# Altium PCB PCB.PcbDoc (part 1 of 2)
Units mm, origin at the board's own origin, x right, y up, seen from the top; angles counter-clockwise.
Board outline 38 x 40 mm, 4 copper layers (Top Layer, Inner GND 1, Inner GND 2, Bottom Layer), stack 1.62 mm thick; 82 components, 76 nets, 342 pads, 250 vias.
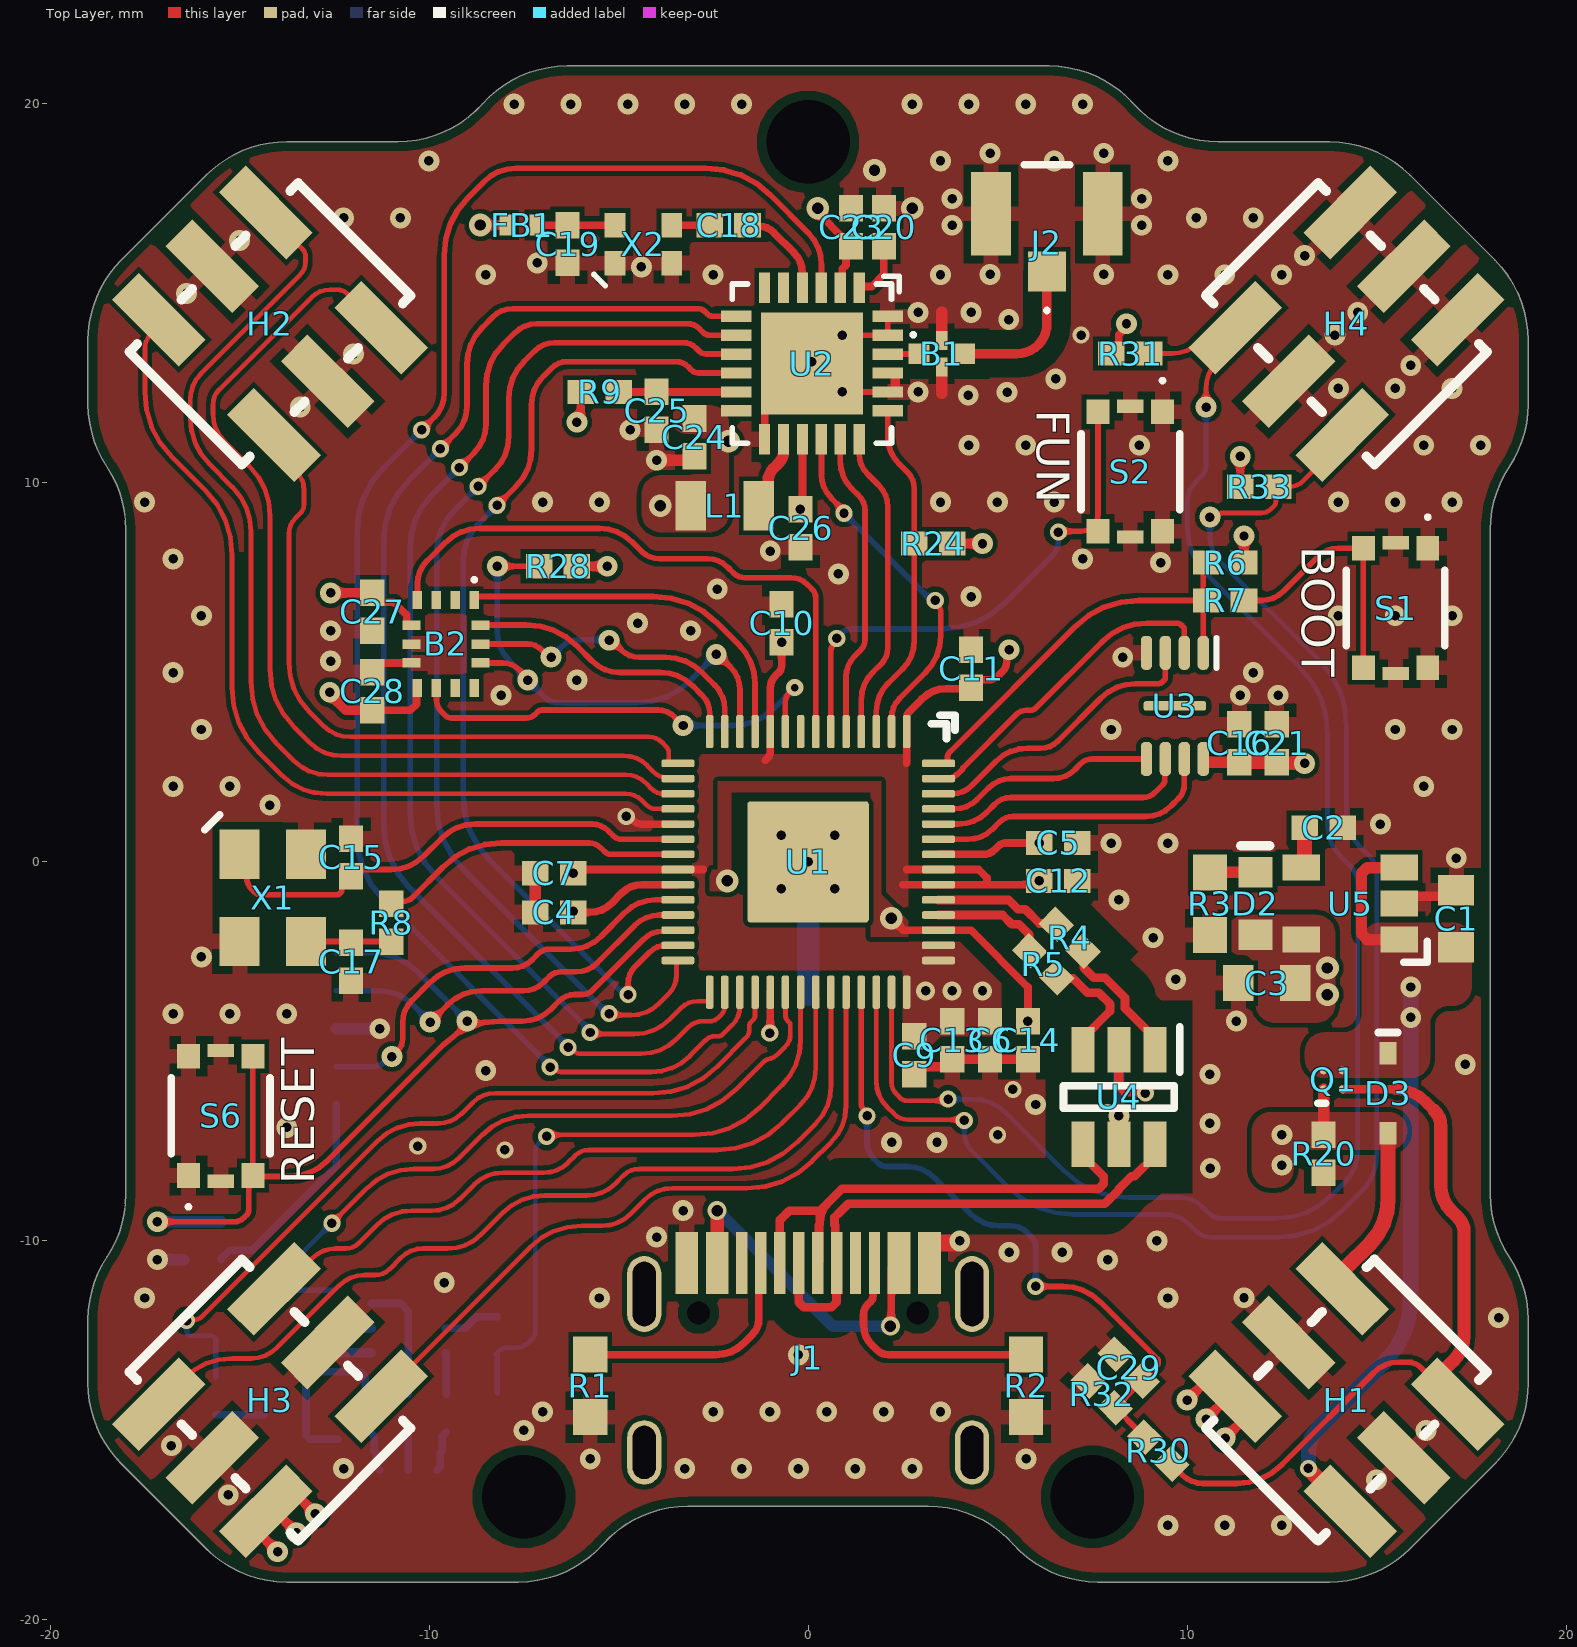
[diagram p0: Top Layer view]
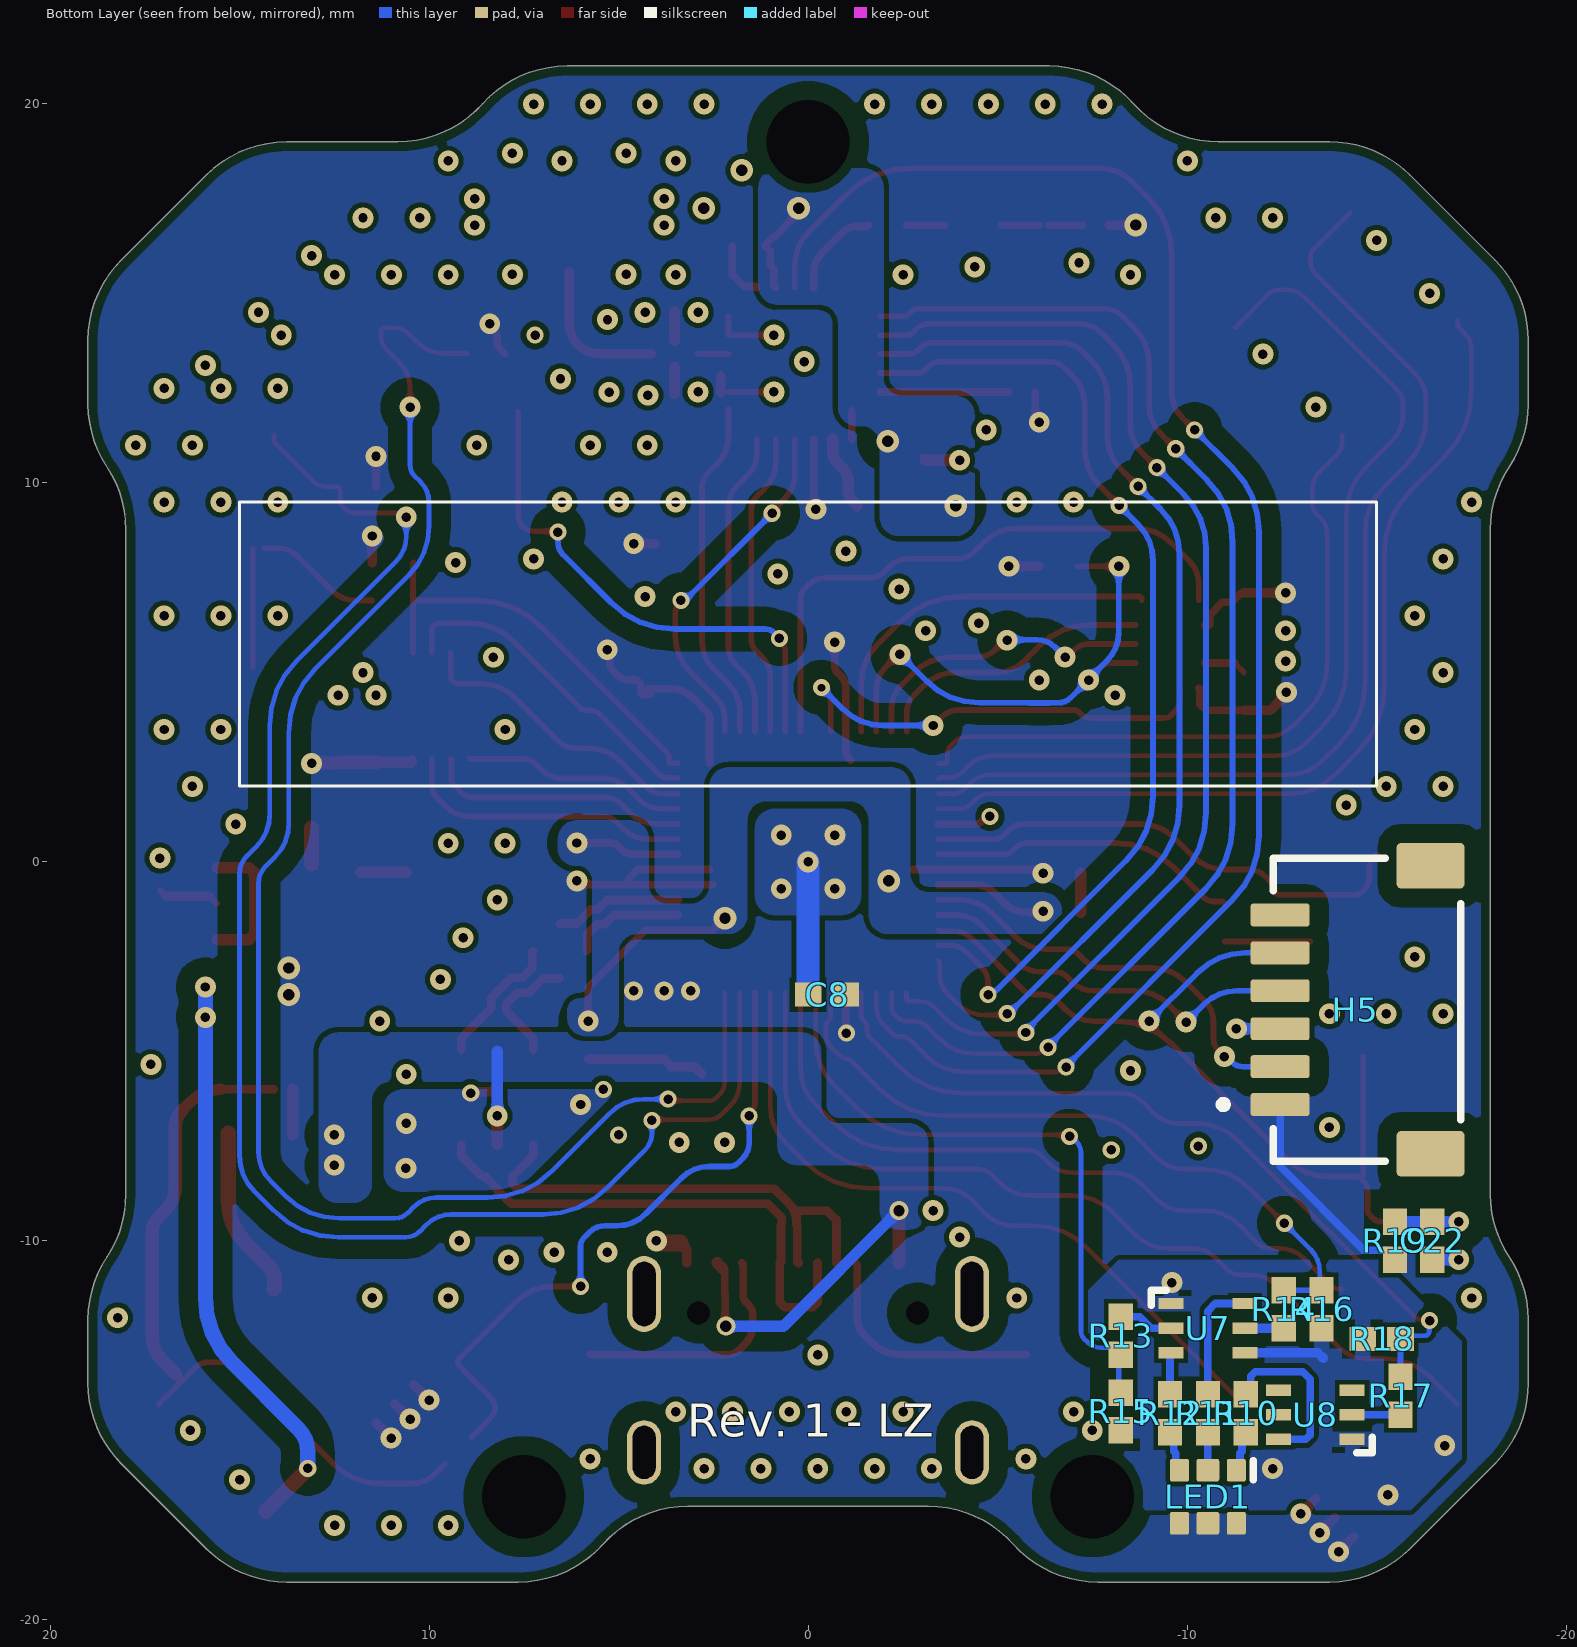
[diagram p1: Bottom Layer view, seen from below]
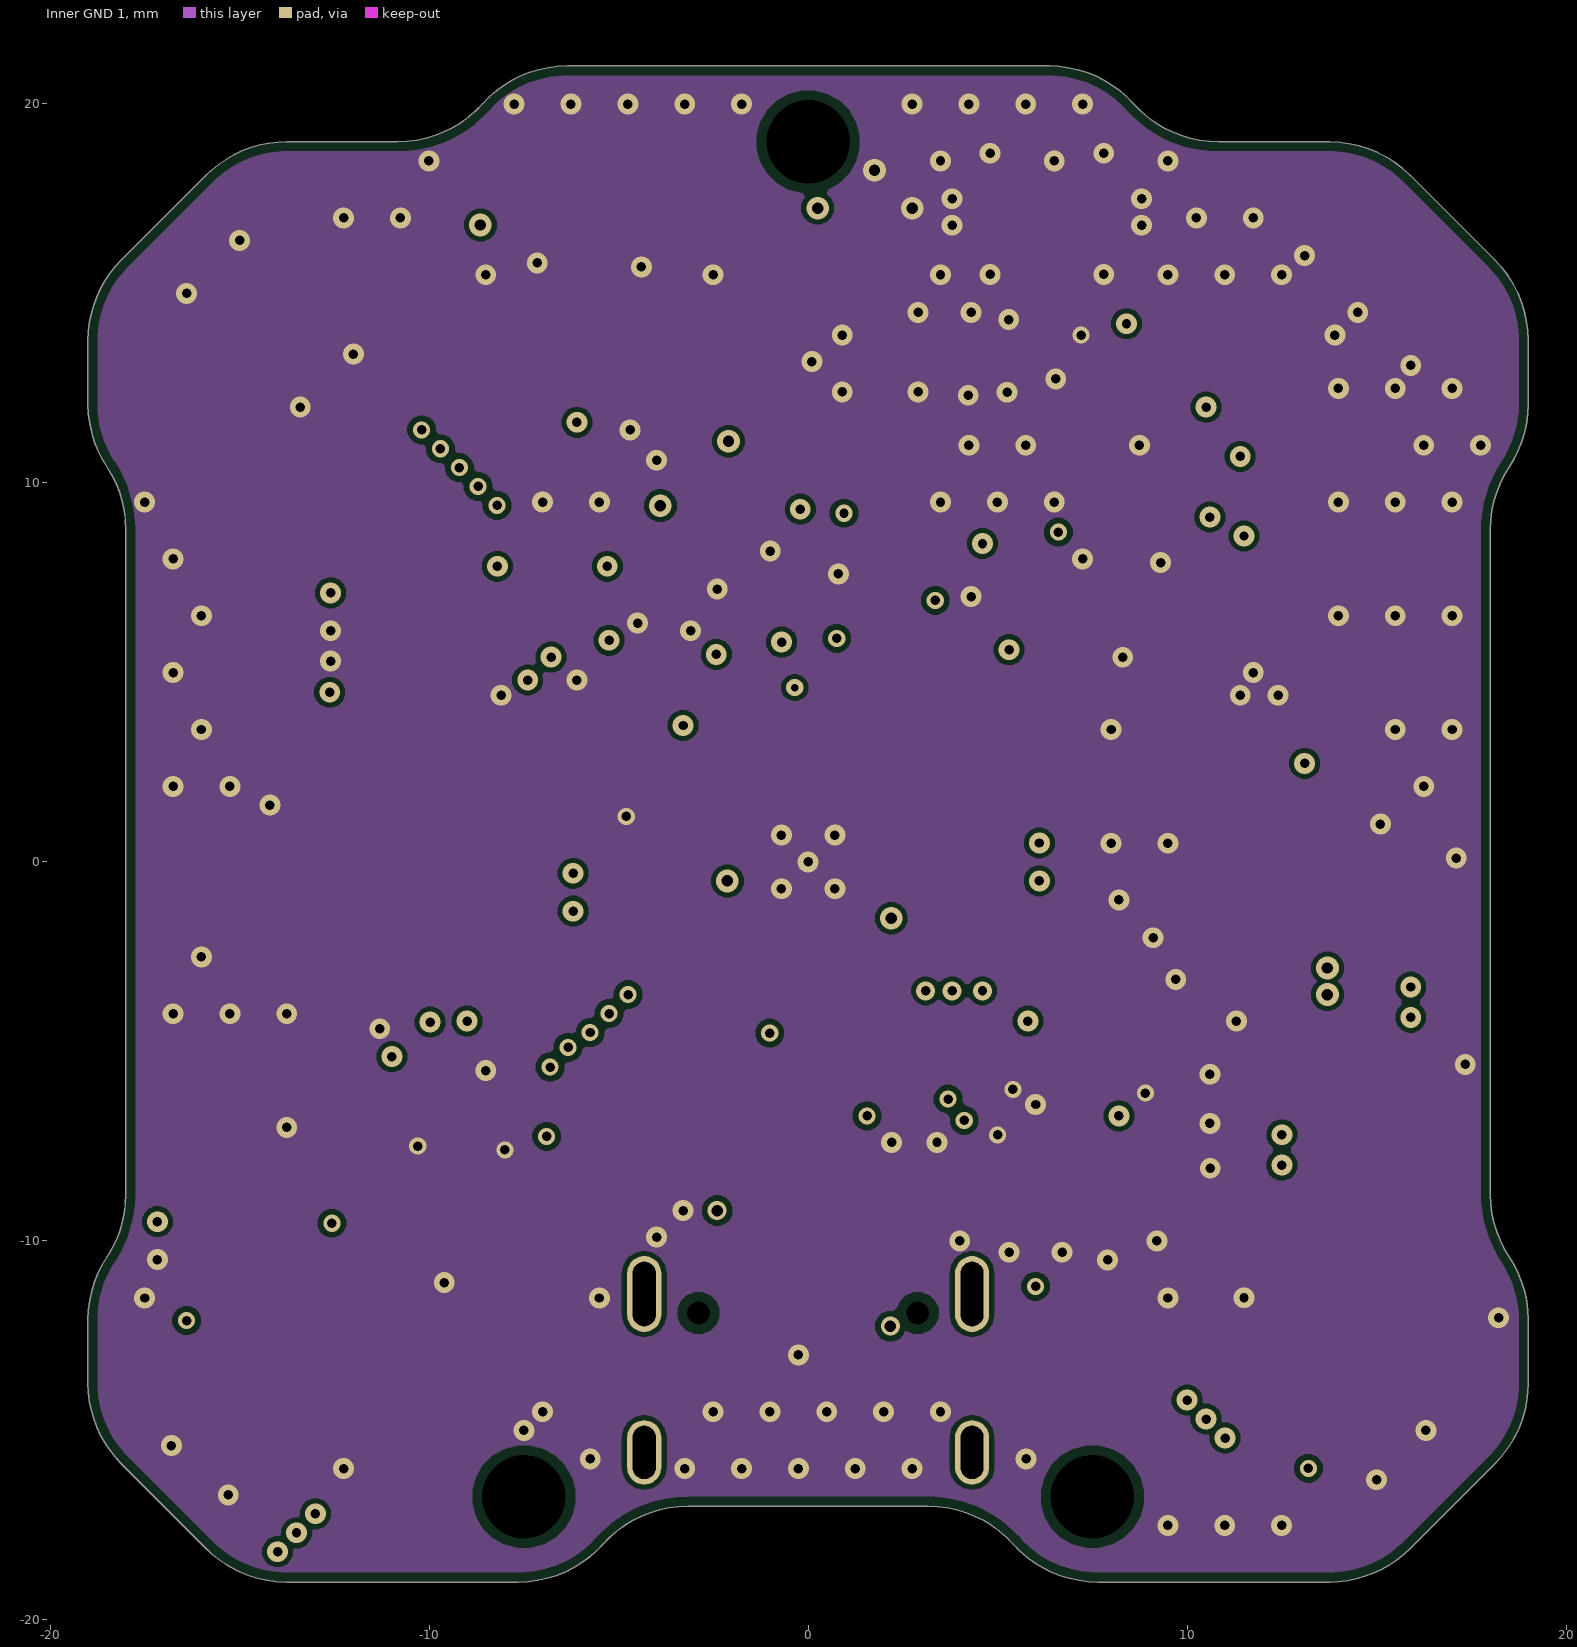
[diagram p2: Inner GND 1]
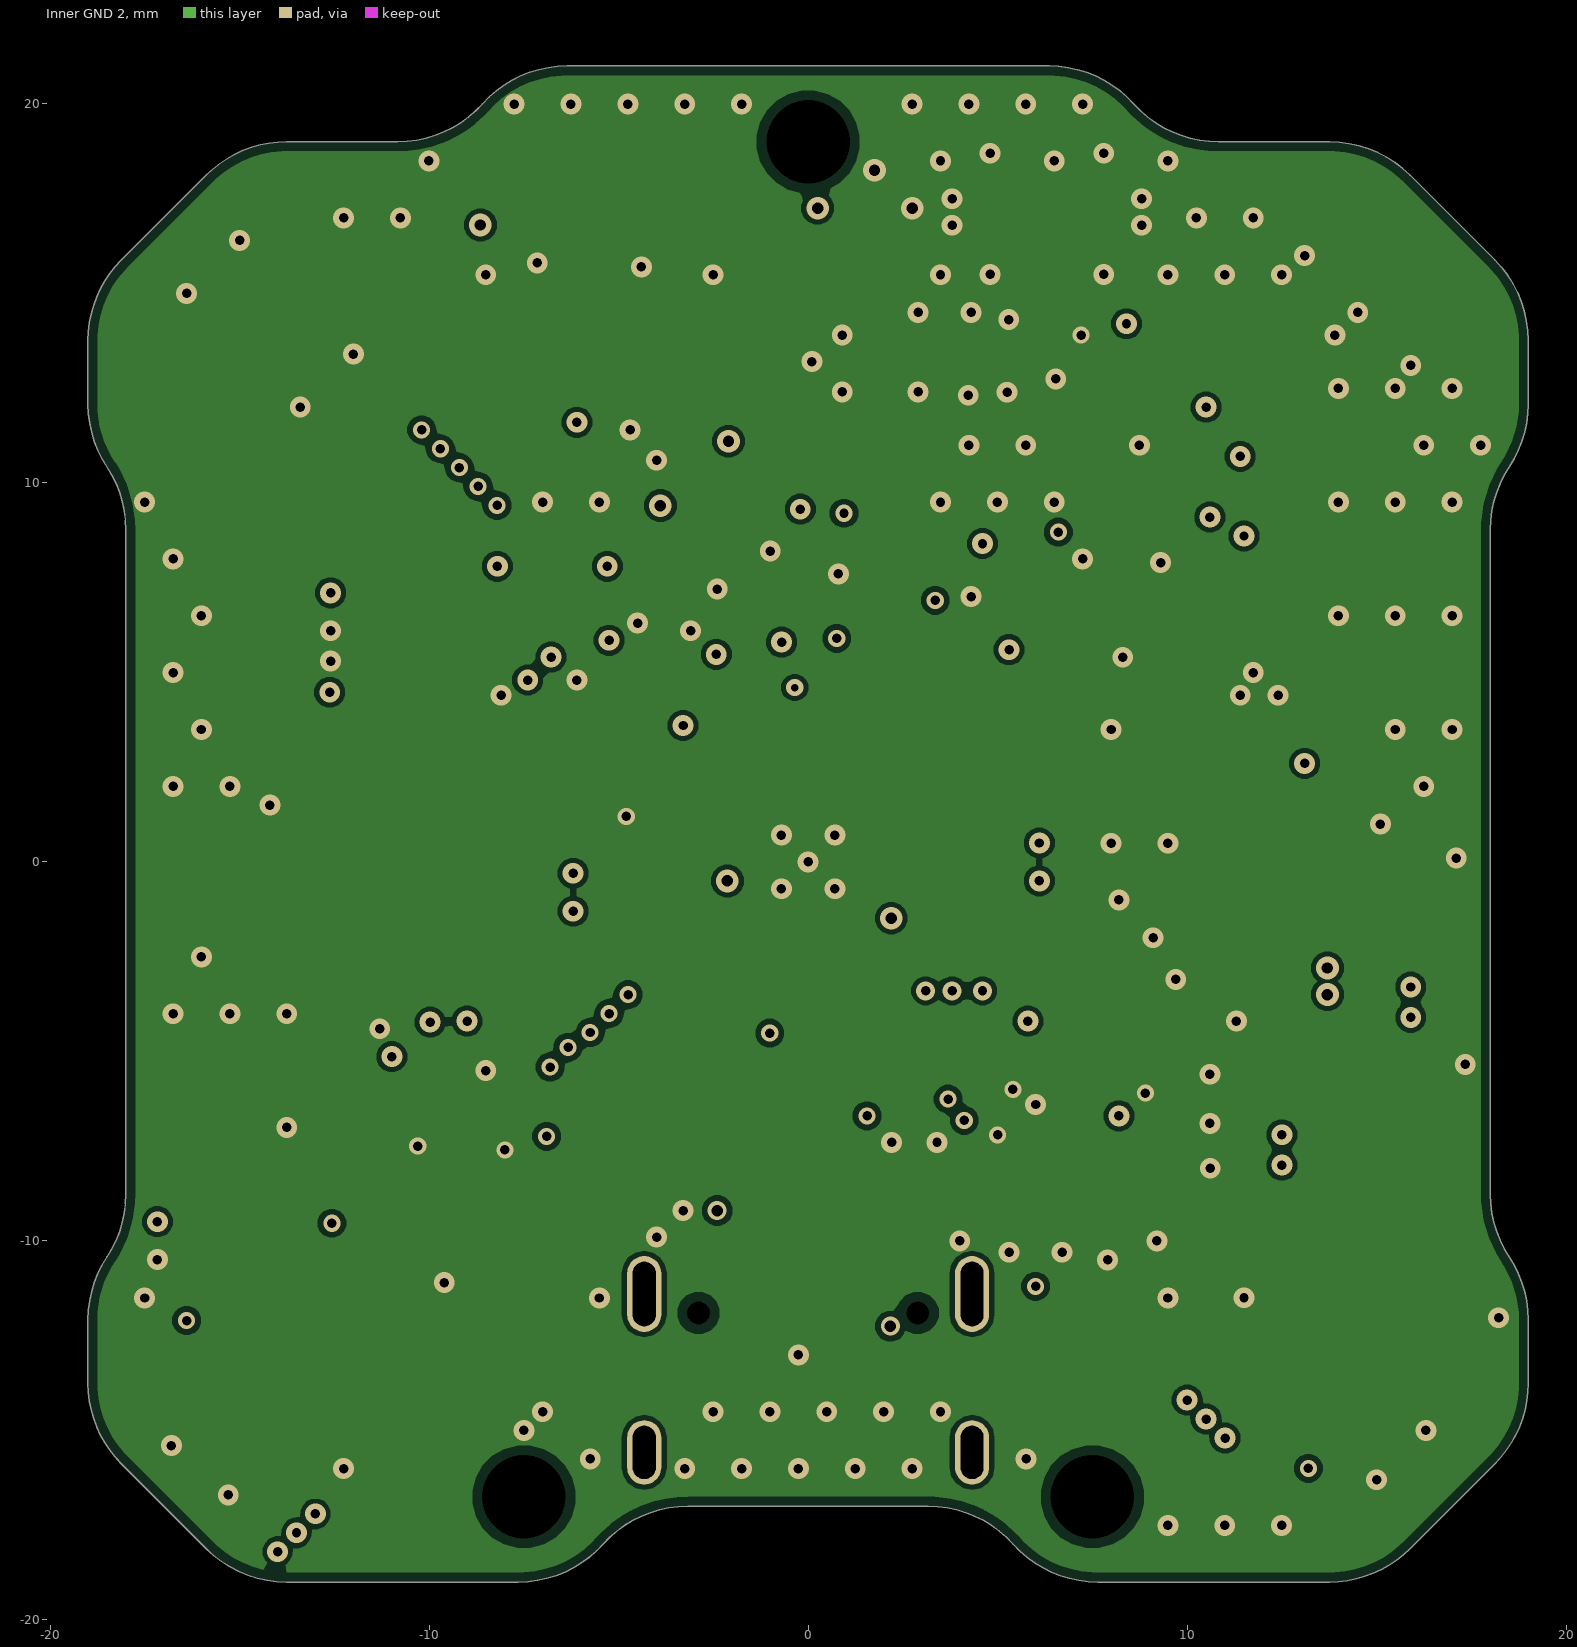
[diagram p3: Inner GND 2]

## Layer stack, top to bottom
Top Solder: solder mask 0.0102, Solder Resist, Dk 3.5
Top Layer: signal copper 0.035
Dielectric 2: prepreg 0.14, PP-006, Dk 4.1
Inner GND 1: signal copper 0.035
Dielectric 1: dielectric 1.2, FR-4, Dk 4.8
Inner GND 2: signal copper 0.035
Dielectric 3: prepreg 0.14, PP-006, Dk 4.1
Bottom Layer: signal copper 0.035
Bottom Solder: solder mask 0.0102, Solder Resist, Dk 3.5

## Board outline
-15.88,-18.12 -18.123,-15.878 cw(c-16.001,-13.756) -19.001,-13.756 -19.001,-12.079 cw(c-16.001,-12.079) -18.501,-10.421 ccw(c-21.001,-8.763) -18.001,-8.763 -18.001,8.765 ccw(c-21.001,8.765) -18.501,10.423 cw(c-16.001,12.082) -19.001,12.082 -19.001,13.758 cw(c-16.001,13.758) -18.123,15.88 -15.88,18.122 cw(c-13.759,16.001) -13.759,19.001 -10.83,19.001 ccw(c-10.83,22.001) -8.594,20.001 cw(c-6.358,18.001) -6.358,21.001 6.355,21.001 cw(c6.355,18.001) 8.591,20.001 ccw(c10.827,22.001) 10.827,19.001 13.756,19.001 cw(c13.756,16.001) 15.877,18.122 18.12,15.88 cw(c15.999,13.758) 18.999,13.758 18.999,12.082 cw(c15.999,12.082) 18.499,10.423 ccw(c20.999,8.765) 17.999,8.765 17.999,-8.763 ccw(c20.999,-8.763) 18.499,-10.421 cw(c15.999,-12.079) 18.999,-12.079 18.999,-13.756 cw(c15.999,-13.756) 18.12,-15.878 15.877,-18.12 cw(c13.756,-15.999) 13.756,-18.999 7.642,-18.999 cw(c7.642,-15.999) 5.406,-17.999 ccw(c3.17,-19.999) 3.17,-16.999 -3.173,-16.999 ccw(c-3.173,-19.999) -5.409,-17.999 cw(c-7.645,-15.999) -7.645,-18.999 -13.759,-18.999 cw(c-13.759,-15.999)

## Design rules (kind name [scope] priority, off if disabled: settings)
BoardOutlineClearance [All] p1: gap=0 ignorepadtopadclearanceinfootprint=FALSE except(0.2: Track-OutlineEdge Track-CavityEdge Track-CutoutEdge Track-SplitBarrior Track-SplitContinuation Via-OutlineEdge Via-CavityEdge Via-CutoutEdge Via-SplitBarrior Via-SplitContinuation Fill-OutlineEdge Fill-CavityEdge Fill-CutoutEdge Fill-SplitBarrior Fill-SplitContinuation; 0.25: Poly-OutlineEdge Poly-CavityEdge Poly-CutoutEdge Poly-SplitBarrior Poly-SplitContinuation)
Clearance Clearance_3v3 [InNet('+3V3') AND OnLayer('Bottom Layer') AND InPoly vs NOT InPoly AND (NOT InNet('GND'))] p1: gap=0.5 ignorepadtopadclearanceinfootprint=FALSE
Clearance Clearance_NPTH [IsBoardCutoutRegion vs InNet('GND')] p2: gap=0.25 ignorepadtopadclearanceinfootprint=FALSE
Clearance Clearance_DiffUSB [InNet('MCU_USB_D_P') OR InNet('MCU_USB_D_N') OR InNet('USB_D_P') OR InNet('USB_D_N') or InNet('MCU_USB_TERM_D_N') or InNet('MCU_USB_TERM_D_P') vs InNet('GND')] p3: gap=0.7 ignorepadtopadclearanceinfootprint=FALSE except(0.089: SMDPad-THPad THPad-THPad; 0.127: Arc-Arc Arc-Track Arc-SMDPad Arc-THPad Arc-Text Track-Track Track-SMDPad Track-THPad Track-Text SMDPad-SMDPad SMDPad-Via SMDPad-Text THPad-Via THPad-Text Via-Text Fill-Text Poly-Text Region-Text Text-Text; 0.25: Arc-Hole Track-Hole SMDPad-Hole THPad-Hole Via-Hole Fill-Hole Poly-Hole Region-Hole Text-Hole; 0.254: Arc-Via Track-Via Via-Via)
Clearance Clearance_RF [InNet('RF') AND (IsTrack OR IsArc) vs (InNet('GND') AND InPoly)] p4: gap=0.5 ignorepadtopadclearanceinfootprint=FALSE except(0.089: SMDPad-THPad THPad-THPad; 0.127: Arc-Arc Arc-Track Arc-SMDPad Arc-THPad Arc-Text Track-Track Track-SMDPad Track-THPad Track-Text SMDPad-SMDPad SMDPad-Via SMDPad-Text THPad-Via THPad-Text Via-Text Fill-Text Poly-Text Region-Text Text-Text; 0.25: Arc-Hole Track-Hole SMDPad-Hole THPad-Hole Via-Hole Fill-Hole Poly-Hole Region-Hole Text-Hole; 0.254: Arc-Via Track-Via Via-Via)
Clearance [All] p5: gap=0.127 ignorepadtopadclearanceinfootprint=FALSE except(0.089: SMDPad-THPad THPad-THPad; 0.25: Arc-Hole Track-Hole SMDPad-Hole THPad-Hole Via-Hole Fill-Hole Poly-Hole Region-Hole Text-Hole; 0.254: Arc-Via Track-Via Via-Via)
ComponentClearance ComponentClearance_1 [HasFootprint('SX1280IMLTRT') vs HasFootprint('2450FM07D0034001T')] p1: gap=0.006 collisioncheckmode=3 verticalgap=0.254 showdistances=FALSE
ComponentClearance [All] p2: gap=0.127 collisioncheckmode=3 verticalgap=0.254 showdistances=FALSE
DiffPairsRouting [All] p1: maxlimit=0.254 minlimit=0.165 mostfreqgap=0.254 toplayer_maxgap=0.165 toplayer_prefgap=0.165 toplayer_minwidth=0.23 toplayer_maxwidth=0.23 toplayer_prefwidth=0.23 midlayer1_mingap=0.254 midlayer1_minwidth=0.381 midlayer1_maxwidth=0.381 midlayer1_prefwidth=0.381 midlayer2_mingap=0.254 midlayer2_minwidth=0.381 midlayer2_maxwidth=0.381 midlayer2_prefwidth=0.381 bottomlayer_mingap=0.254 bottomlayer_minwidth=0.381 bottomlayer_maxwidth=0.381 bottomlayer_prefwidth=0.381 maxuncoupledlength=12.7
MinimumAnnularRing [All] p1: minimumring=0.1
MinimumSolderMaskSliver [All] p1: minsoldermaskwidth=0.04
PlaneConnect [All] p1: planeconnectstyle=Direct reliefexpansion=0.508 reliefentries=4 reliefconductorwidth=0.254 reliefairgap=0.254
PolygonConnect [InNet('GND')] p1: thpad.connectstyle=Relief thpad.reliefconductorwidth=0.4 thpad.reliefentries=4 thpad.polygonreliefangle="90 Angle" thpad.airgapwidth=0.2 smdpad.connectstyle=Relief smdpad.reliefconductorwidth=0.4 smdpad.reliefentries=4 smdpad.polygonreliefangle="90 Angle" smdpad.airgapwidth=0.2 via.connectstyle=Direct via.reliefconductorwidth=0.4 via.reliefentries=4 via.polygonreliefangle="90 Angle" via.airgapwidth=0.2
PolygonConnect PolygonConnect_AllButGND [Not InNet('GND') vs Not InNet('GND')] p2: connectstyle=Direct reliefconductorwidth=0.254 reliefentries=4 polygonreliefangle="90 Angle" airgapwidth=0.254
RoutingVias [All] p1: holewidth=0.25 width=0.55 viastyle="Through Hole" minholewidth=0.2 minwidth=0.45 maxholewidth=0.35 maxwidth=0.7
SilkToSilkClearance [All] p1: silktosilkclearance=0.15
SilkToSolderMaskClearance [IsPad] p1: minsilkscreentomaskgap=0.085 clearancetoexposedcopper=TRUE
SolderMaskExpansion [All] p1: expansion=0.038 istentingtop=FALSE
SupplyNets "Schematic Supply Nets_3" [InNet('+VUSB')] p1: voltage=0.000
SupplyNets "Schematic Supply Nets_2" [InNet('+VBAT')] p2: voltage=0.000
SupplyNets "Schematic Supply Nets" [InNet('+VSYS')] p3: voltage=0.000
SupplyNets "Schematic Supply Nets_7" [InNet('+3V3')] p4: voltage=0.000
SupplyNets "Schematic Supply Nets_4" [InNet('+1V1')] p5: voltage=0.000
SupplyNets "Schematic Supply Nets_1" [InNet('GND')] p6: voltage=0.000
Width Width_RF [InNet('RF')] p1: maxlimit=0.25 minlimit=0.111 preferedwidth=0.25 toplayer_minwidth=0.25 midlayer1_maxwidth=0.111 midlayer1_prefwidth=0.111 midlayer2_maxwidth=0.111 midlayer2_prefwidth=0.111 bottomlayer_minwidth=0.25 impedanceprofiledriven=TRUE impedanceprofileid={F64C656D-1B4E-4BC5-BB87-F1306D944459} impedanceprofilevalue=50.000000 minimp=50.000000 maximp=50.000000 favimp=50.000000
Width [All] p2: maxlimit=1 minlimit=0.12 preferedwidth=0.254 toplayer_prefwidth=0.15 midlayer1_prefwidth=0.15 midlayer2_minwidth=0.2 bottomlayer_prefwidth=0.15 minimp=50.000000 maximp=50.000000 favimp=50.000000
24 further rules are at their usual default settings.

## Classes and differential pairs
component class RF: B1 C18 C19 C20 C23 C24 C25 C26 FB1 J2 L1 R9 U2 X2
component class MCU: C4 C5 C6 C7 C8 C9 C10 C11 C12 C13 C14 C15 C16 C17 C21 C22 R4 R5 R6 R7 R8 R19 R24 R28 U1 U3 X1
component class Power: C1 C2 C3 D2 D3 J1 Q1 R1 R2 R3 R20 U4 U5
differential pair class DIFFPAIRUSBMCU: MCU_USB_D MCU_USB_TERM_D
component class Interfacing: B2 C27 C28 C29 H1 H2 H3 H4 H5 LED1 R10 R11 R12 R13 R14 R15 R16 R17 R18 R30 R31 R32 R33 S1 S2 S6 U7 U8
differential pair MCU_USB_TERM_D: +MCU_USB_TERM_D_P -MCU_USB_TERM_D_N
differential pair USB_D: +USB_D_P -USB_D_N
differential pair MCU_USB_D: +MCU_USB_D_P -MCU_USB_D_N

## Components (designator, comment, footprint, x,y, rotation, side; value= is the part's Value field where it differs from the comment)
B1 "2450FM07D0034001T" 2450FM07D0034001T 3.523,13.409 r0 top
B2 "BMI270" BMI270 -9.558,5.75 r270 top
C1 "2u2" CAP_0603_L 17.1,-1.5 r270 top
C2 "100n" CAP_0402 13.6,0.9 r180 top
C3 "2u2" CAP_0603_L 12.1,-3.2 r0 top
C4 "100n" CAP_0402 -6.7,-1.331 r0 top
C5 "100n" CAP_0402 6.6,0.5 r180 top
C6 "1u" CAP_0402 4.8,-4.7 r90 top
C7 "100n" CAP_0402 -6.7,-0.3 r0 top
C8 "100n" CAP_0402 -0.5,-3.5 r180 bottom
C9 "100n" CAP_0402 2.8,-5.1 r90 top
C10 "100n" CAP_0402 -0.7,6.3 r270 top
C11 "100n" CAP_0402 4.3,5.1 r270 top
C12 "100n" CAP_0402 6.6,-0.5 r180 top
C13 "100n" CAP_0402 3.8,-4.7 r90 top
C14 "1u" CAP_0402 5.8,-4.7 r90 top
C15 "15pF" CAP_0402 -12.06,0.118 r90 top
C16 "100n" CAP_0402 11.373,3.127 r270 top
C17 "15pF" CAP_0402 -12.06,-2.637 r270 top
C18 "1n" CAP_0402 -2.1,16.8 r0 top
C19 "100n" CAP_0402 -6.349,16.304 r90 top
C20 "10n" CAP_0402 2,16.75 r270 top
C21 "1u" CAP_0402 12.363,3.127 r270 top
C22 "DNP" CAP_0402 -16.469,-9.992 r90 bottom
C23 "10n" CAP_0402 1.133,16.75 r270 top
C24 "470n" CAP_0402 -3,11.2 r90 top
C25 "100n" CAP_0402 -4,11.9 r90 top
C26 "100n" CAP_0402 -0.2,8.8 r90 top
C27 "100n" CAP_0402 -11.5,6.6 r90 top
C28 "100n" CAP_0402 -11.5,4.5 r270 top
C29 "100n" CAP_0402 8.454,-13.339 r315 top
D2 "SMD_LED_0603" SMD_LED_0603 11.8,-1.1 r90 top
D3 "B0520WS-7-F" SOD323 15.3,-6.1 r270 top
FB1 "600R" FB_0402 -7.549,16.804 r0 top
H1 "NPPN032FFKS" NPPN032FFKS 14.2,-14.2 r45 top
H2 "NPPN032FFKS" NPPN032FFKS -14.2,14.2 r45 top
H3 "NPPN032FFKS" NPPN032FFKS -14.2,-14.2 r135 top
H4 "NPPN032FFKS" NPPN032FFKS 14.2,14.2 r315 top
H5 "AMPHENOL-10147606-00006LF" AMPHENOL-10147606-00006LF -15,-3.9 r90 bottom
J1 "USB-type-c-31-m-12" USB-type-c-31-m-12 0,-11.4 r0 top locked
J2 "CONUFL001-SMD-T" CONUFL001SMDT 6.3,17.1 r0 top
L1 "15uH" INDUCTOR_0805 -2.2,9.4 r180 top
LED1 "19-337/R6GHBHC-A01/2T" RGB_SMD_1616 -10.55,-16.75 r270 bottom
Q1 "CSD25213W10" CSD25213W10 13.85,-5.75 r90 top
R1 "5k1" RES_0603 -5.75,-13.825 r90 top
R2 "5k1" RES_0603 5.75,-13.825 r90 top
R3 "1k" RES_0603 10.6,-1.1 r90 top
R4 "27R4" RES_0402 6.9,-2 r315 top
R5 "27R4" RES_0402 6.2,-2.7 r315 top
R6 "DNP" RES_0402 11,7.9 r0 top
R7 "1k" RES_0402 11,6.9 r0 top
R8 "1k" RES_0402 -11,-1.6 r90 top
R9 "0R" RES_0402 -5.5,12.4 r0 top
R10 "100" RES_0402 -11.55,-14.55 r90 bottom
R11 "220" RES_0402 -10.55,-14.55 r90 bottom
R12 "100" RES_0402 -9.55,-14.55 r90 bottom
R13 "220" RES_0402 -8.25,-12.5 r90 bottom
R14 "220" RES_0402 -12.55,-11.8 r270 bottom
R15 "10k" RES_0402 -8.25,-14.5 r270 bottom
R16 "10k" RES_0402 -13.55,-11.8 r270 bottom
R17 "220" RES_0402 -15.632,-14.087 r270 bottom
R18 "10k" RES_0402 -15.132,-12.587 r0 bottom
R19 "DNP" RES_0402 -15.485,-9.992 r270 bottom
R20 "47k" RES_0402 13.6,-7.7 r90 top
R24 "10k" RES_0402 3.3,8.4 r0 top
R28 "10k" RES_0402 -6.6,7.8 r0 top
R30 "22k" RES_0402 9.231,-15.531 r315 top
R31 "4k7" RES_0402 8.5,13.414 r180 top
R32 "22k" RES_0402 7.746,-14.046 r315 top
R33 "4k7" RES_0402 11.9,9.9 r180 top
S1 "435151014824" 435151014824 15.5,6.7 r270 top
S2 "435151014824" 435151014824 8.5,10.3 r270 top
S6 "435151014824" 435151014824 -15.5,-6.7 r90 top
U1 "RP2040" "QFN56 7x7 RP2040" 0,0 r270 top locked
U2 "SX1280IMLTRT" SX1280IMLTRT 0.1,13.15 r270 top locked
U3 "W25Q16JVUXIQ TR" "USON-8 - 2x3" 9.676,4.117 r270 top
U4 "USBLC6-2SC6" SOT95P280X145-6N 8.2,-6.2 r270 top
U5 "MIC5323-3.3YD5-TR" SPX3819M5-L-3-3/TR 14.3,-1.1 r90 top
U7 "NTJD4001NT1G" SOT363/SC-88 -10.55,-12.3 r270 bottom
U8 "NTJD4001NT1G" SOT363/SC-88 -13.382,-14.587 r90 bottom
X1 "ABM8-272-T3" ABM8-272-T3 -14.125,-0.95 r270 top
X2 "ECS-TXO-16CSMV4-520-AY-TR" ECS-TXO-16CSMV4-520-AY-TR -4.35,16.3 r0 top

## Footprints (in the part's own frame and the unit in brackets; to place one, negate y for a bottom-side part, rotate by r counter-clockwise, add the part's x,y. Pads: shape width x height; smd on the part's side, far side on the other; paste and mask are expansions set on the pad)
2450FM07D0034001T [mm]
  rect 0.55x0.55 smd mask-2539.97: 1(-0.6,0) 3(0.6,0)
  rect 0.3x0.5 smd mask+0.102: 2(0,-0.35) 4(0,0.35)
  silkscreen extent -0.8,0.45 -0.7,0.55, body extent -0.5,-0.25 0.5,0.25, height 0.41
435151014824 [mm]
  rect 0.65x0.6 smd mask+0.04: 1(-1.575,0.85) 2(1.575,0.85) 3(-1.575,-0.85) 4(1.575,-0.85)
  rect 0.35x0.7 smd mask+0.04: 5(-1.725,0) 6(1.725,0)
  silkscreen extent -2.45,-1.3 1,1.3, body extent -1.75,-1.3 1.75,1.3, height 1.41
ABM8-272-T3 [mm] "Crystals Ultra Miniature Ceramic SMD Crystal / 3.2mm x 2.5mm"
  rect 1.3x1.05 smd mask+0.04: 1(-1.15,-0.875) 2(1.15,-0.875) 3(1.15,0.875) 4(-1.15,0.875)
  silkscreen extent -2.2,-1.8 -1.8,-1.4, body extent -1.6,-1.25 1.6,1.25, height 0.8
AMPHENOL-10147606-00006LF [mm] "Amphenol,1mm pitch, 6 Pos, 1 Row, SMD, Wire-to-Board, Right Angle, Male"
  rrect20% 0.6x1.55 smd mask+0.05: 1(-2.5,2.545) 2(-1.5,2.545) 3(-0.5,2.545) 4(0.5,2.545) 5(1.5,2.545) 6(2.5,2.545)
  rrect20% 1.2x1.8 smd: SH1(-3.8,-1.425) SH2(3.8,-1.425)
  silkscreen extent -4,-2.22 4,4.15, body extent -4,-2.12 4,2.82, height 2.9
BMI270 [mm]
  rect 0.475x0.25 smd mask+0.04: 1(-1.163,0.75) 2(-1.163,0.25) 3(-1.163,-0.25) 4(-1.163,-0.75) 8(1.162,-0.75) 9(1.162,-0.25) 10(1.162,0.25) 11(1.162,0.75)
  rect 0.25x0.475 smd mask+0.04: 5(-0.5,-0.913) 6(0,-0.913) 7(0.5,-0.913) 12(0.5,0.913) 13(0,0.913) 14(-0.5,0.913)
  silkscreen extent -1.75,0.7 -1.65,0.8, body extent -1.5,-1.25 1.5,1.25, height 0.7
CAP_0402 [mm] "generic 0402 cap footprint"
  rect 0.7x0.64 smd mask+0.05: 1(-0.5,0) 2(0.5,0)
  body extent -0.55,-0.3 0.55,0.3, height 0.6
CAP_0603_L [mm] "generic, 0.1mm longer (max pad-to-pad) for better hand-solderability"
  rect 0.8x0.95 smd mask+0.05: 1(-0.75,0) 2(0.75,0)
  body extent -0.95,-0.45 0.95,0.45, height 0.8
CONUFL001SMDT [mm]
  rect 1x1.05 smd: 1(0,-1.525)
  rect 1.05x2.2 smd: 2(1.475,0) 3(-1.475,0)
  silkscreen extent -0.6,-2.6 0.6,1.3, body extent -1.5,-1.55 1.5,1.55, height 1.3
CSD25213W10 [mm] "2x2 BGA 1mm^2"
  round 0.21 smd mask+0.05: A1(-0.25,0.25) A2(0.25,0.25) B1(-0.25,-0.25) B2(0.25,-0.25)
  silkscreen extent -0.62,0.2 -0.62,0.4, body extent -0.5,-0.5 0.5,0.5, height 0.62
ECS-TXO-16CSMV4-520-AY-TR [mm] "TCXO Oscillators 52.000 MHz MultiVolt TCXO Clipped Sine Wave 1.7 - 3.6 0.5 ppm -30 - +85C 1.6 x 1.2 mm 4 Pad SM"
  rect 0.55x0.65 smd mask+0.04: 1(-0.75,-0.5) 2(0.75,-0.5) 3(0.75,0.5) 4(-0.75,0.5)
  silkscreen extent -1.3,-1.1 -1,-0.8, body extent -0.8,-0.6 0.8,0.6, height 0.59
FB_0402 [mm] "Chip Inductor, 2-Leads, Body 1,00x0,50mm, IPC Medium Density"
  rect 0.4x0.55 smd mask+0.04: 1(-0.4,0) 2(0.4,0)
  body extent -0.5,-0.25 0.5,0.25, height 0.5
INDUCTOR_0805 [mm] "Generic inductor (L) 0805"
  rect 0.8x1.3 smd mask+0.04: 1(-0.9,0) 2(0.9,0)
  body extent -1,-0.63 1,0.63, height 1.25
NPPN032FFKS [mm] "smd header 3x2"
  rect 1x2.5 smd: 1(-2,2.15) 2(0,2.15) 3(2,2.15) 4(2,-2.15) 5(0,-2.15) 6(-2,-2.15)
  silkscreen extent -3.15,-2.1 3.15,2.1, body extent -3,-2.9 3,2.9, height 4.4
"QFN56 7x7 RP2040" [mm] "Recommended PCB / Footprint for the / RP2040 QFN-56 / package"
  rrect50% 0.875x0.2 smd paste-0.01 mask+0.04: 1(-3.437,2.6) 2(-3.437,2.2) 3(-3.437,1.8) 4(-3.437,1.4) 5(-3.437,1) 6(-3.437,0.6) 7(-3.437,0.2) 8(-3.437,-0.2) 9(-3.437,-0.6) 10(-3.437,-1) 11(-3.437,-1.4) 12(-3.437,-1.8) 13(-3.437,-2.2) 14(-3.437,-2.6) 29(3.437,-2.6) 30(3.437,-2.2) 31(3.437,-1.8) 32(3.437,-1.4) 33(3.437,-1) 34(3.437,-0.6) 35(3.437,-0.2) 36(3.437,0.2) 37(3.437,0.6) 38(3.437,1) 39(3.437,1.4) 40(3.437,1.8) 41(3.437,2.2) 42(3.437,2.6)
  rrect50% 0.2x0.875 smd paste-0.01 mask+0.04: 15(-2.6,-3.437) 16(-2.2,-3.437) 17(-1.8,-3.437) 18(-1.4,-3.437) 19(-1,-3.437) 20(-0.6,-3.437) 21(-0.2,-3.437) 22(0.2,-3.437) 23(0.6,-3.437) 24(1,-3.437) 25(1.4,-3.437) 26(1.8,-3.437) 27(2.2,-3.437) 28(2.6,-3.437) 43(2.6,3.437) 44(2.2,3.437) 45(1.8,3.437) 46(1.4,3.437) 47(1,3.437) 48(0.6,3.437) 49(0.2,3.437) 50(-0.2,3.437) 51(-0.6,3.437) 52(-1,3.437) 53(-1.4,3.437) 54(-1.8,3.437) 55(-2.2,3.437) 56(-2.6,3.437)
  rrect5% 3.2x3.2 smd paste-2539.97 mask+0.04: 57(0,0)
  silkscreen extent -3.87,3.25 -3.25,3.87, body extent -3.5,-3.5 3.5,3.5, height 0.9
RES_0402 [mm] "0402 Chip Resistor, 2-Leads, Body 1,00x0,5mm, IPC Medium Density"
  rect 0.7x0.64 smd mask+0.04: 1(-0.5,0) 2(0.5,0)
  body extent -0.55,-0.3 0.55,0.3, height 0.4
RES_0603 [mm] "0603 Chip Resistor, 2-Leads, Body 1,85x1,05mm, IPC Medium Density"
  rect 0.95x0.9 smd mask+0.05: 1(-0.825,0) 2(0.825,0)
  body extent -0.95,-0.45 0.95,0.45, height 0.8
RGB_SMD_1616 [mm] "3.5mm height, 1.6mm x 1.6mm, 6-pad, RGB"
  rrect20% 0.6x0.5 smd mask+0.03: 1(-0.7,0.75) 3(-0.7,-0.75) 4(0.7,0.75) 6(0.7,-0.75)
  rrect20% 0.6x0.6 smd mask+0.03: 2(-0.7,0) 5(0.7,0)
  silkscreen extent -0.95,1.2 -0.45,1.2, body extent -0.8,-0.8 0.8,0.8, height 0.37
SMD_LED_0603 [mm] "Generic 0603 SMD LED. Based on \"KP-1608SGD SUPER BRIGHT GREEN\""
  rect 0.8x0.9 smd: 1(-0.825,0) 2(0.825,0)
  silkscreen extent 1.52,-0.38 1.52,0.38, body extent -0.81,-0.4 0.81,0.4, height 1.1
SOD323 [mm] "Diode directional 1.7mm x 1.3mm"
  rect 0.59x0.45 smd mask+0.045: 1(-1.055,0) 2(1.055,0)
  silkscreen extent -1.6,-0.25 -1.6,0.25, body extent -1.25,-0.65 1.25,0.65, height 1.05
SOT95P280X145-6N [mm]
  rect 1.2x0.6 smd: 1(-1.25,0.95) 2(-1.25,0) 3(-1.25,-0.95) 4(1.25,-0.95) 5(1.25,0) 6(1.25,0.95)
  silkscreen extent -1.85,-1.46 0.3,1.6, body extent -1.4,-1.46 1.4,1.46, height 1.45
SOT363/SC-88 [mm] "6 LEADS"
  rect 0.3x0.66 smd mask+0.04: 1(-0.65,-0.975) 2(0,-0.975) 3(0.65,-0.975) 4(0.65,0.975) 5(0,0.975) 6(-0.65,0.975)
  silkscreen extent -1,-1.5 -0.6,-1.1, body extent -1,-1.05 1,1.05, height 0.95
SPX3819M5-L-3-3/TR [mm] "LDO Voltage Regulators 500mA LOW NOISE LDO"
  rect 0.69x0.99 smd: 1(-0.95,-1.295) 2(0,-1.295) 3(0.95,-1.295) 4(0.95,1.295) 5(-0.95,1.295)
  silkscreen extent -1.55,-2.04 -1,-1.41, body extent -1.45,-1.4 1.45,1.4, height 1.45
SX1280IMLTRT [mm] "RF Transceiver Long range 2.4 GHz Wireless Transceiver"
  rect 0.8x0.3 smd paste-0.01 mask+0.04: 1(-2,1.25) 2(-2,0.75) 3(-2,0.25) 4(-2,-0.25) 5(-2,-0.75) 6(-2,-1.25) 13(2,-1.25) 14(2,-0.75) 15(2,-0.25) 16(2,0.25) 17(2,0.75) 18(2,1.25)
  rect 0.3x0.8 smd paste-0.01 mask+0.04: 7(-1.25,-2) 8(-0.75,-2) 9(-0.25,-2) 10(0.25,-2) 11(0.75,-2) 12(1.25,-2) 19(1.25,2) 20(0.75,2) 21(0.25,2) 22(-0.25,2) 23(-0.75,2) 24(-1.25,2)
  rect 2.7x2.7 smd paste-2539.97 mask+0.04: 25(0,0)
  silkscreen extent -2.3,-2.1 2.1,2.3, body extent -2,-2 2,2, height 0.9
USB-type-c-31-m-12 [mm] "5A 1 16P Female Type-C SMD USB Connectors ROHS"
  oval 0x0.6 hole 0.6 unplated paste-2539.97 mask+0: 11(-2.89,-0.5) 12(2.89,-0.5)
  rect 0.6x1.64 smd paste-0.03 mask+0.04: A1B12(-3.2,0.82) A4B9(-2.4,0.82) B1A12(3.2,0.82) B4A9(2.4,0.82)
  rect 0.3x1.64 smd paste-0.03 mask+0.04: A5(-1.25,0.82) A6(-0.25,0.82) A7(0.25,0.82) A8(1.25,0.82) B5(1.75,0.82) B6(0.75,0.82) B7(-0.75,0.82) B8(-1.75,0.82)
  oval 0.9x1.7 hole 0.6 slot 1.4 at 90 deg mask+0.04: SH(-4.325,-4.18) SH(4.325,-4.18)
  oval 0.9x2 hole 0.6 slot 1.7 at 90 deg mask+0.04: SH(-4.325,0) SH(4.325,0)
  body extent -4.47,-6.85 4.47,0.75, height 3.18
"USON-8 - 2x3" [mm] "8-Lead Plastic Ultra Thin Small Outline No Lead Package (NP) - [2mm x 3mm]  Body [USON] / [Also called UDFN]"
  rrect80% 0.9x0.3 smd mask+0.04: 1(-1.4,0.75) 2(-1.4,0.25) 3(-1.4,-0.25) 4(-1.4,-0.75) 5(1.4,-0.75) 6(1.4,-0.25) 7(1.4,0.25) 8(1.4,0.75)
  rrect50% 0.25x1.65 smd mask+0.04: 9(0,0)
  silkscreen extent -1.8,1.1 -1,1.1, body extent -1.5,-1 1.5,1, height 0.55

## Part data
B1: "2.45GHz Impedance Matched Low Pass Filter Optimized for Semtech SX1280 and SX1281 chipsets", Manufacturer_Name="JOHANSON TECHNOLOGY", Mouser Part Number=609-2450FM07D0034001, Datasheet Link=https://www.digikey.com/en/products/detail/johanson-technology-inc/2450FM07D0034001T/9477815, Geometry.Height=0.4mm, Manufacturer_Part_Number=2450FM07D0034001T, Mouser Price/Stock=https://www.mouser.co.uk/ProductDetail/Johanson-Technology/2450FM07D0034001T?qs=jRuttqqUwMRfALoCk7O%252Bzw%3D%3D
B2: "IMUs - Inertial Measurement Units Smart Ultra-Low Power Inertial Measurement Unit (IMU) for Wearable Applications", Manufacturer_Name=BOSCH, Mouser Part Number=262-BMI270, Datasheet Link=https://www.bosch-sensortec.com/media/boschsensortec/downloads/datasheets/bst-bmi270-ds000.pdf, Geometry.Height=0.87mm, Manufacturer_Part_Number=BMI270, Mouser Price/Stock=https://www.mouser.co.uk/ProductDetail/Bosch-Sensortec/BMI270?qs=u16ybLDytRYIj%252BjQEee88A%3D%3D
C1 C3: library part CAP_0603_X5R_25V, "Capacitor 0603 generic, X5R, 25V"
C2 C4 C5 C6 C7 C8 C9 C10 C11 C12 C13 C14 C16 C19 C20 C21 C22 C23 C24 C25 C26: library part CAP_0402_X5R_25V, "Capacitor 0402 generic, X5R, 25V"
C15 C17 C18: library part CAP_0402_C0G_50V, "Capacitor 0402 generic, C0G (NP0), 50V"
C27 C28 C29: library part CAP_0402, "Capacitor 0402 generic"
D3: "DIODE SCHOTTKY 20V 500MA SOD323"
FB1: library part FB_0402, "Ferrite bead 0402 generic", MPN=BLM15AG601SN1D
H1 H2 H3 H4: "CONN HDR 6POS 0.079 GOLD SMD 3x2, 2mm pitch"
H5: "Amphenol,1mm pitch, 6 Pos, 1 Row, SMD, Wire-to-Board, Right Angle, Male"
J2: "RF Connectors / Coaxial Connectors T&R U.FL Straight Surface Mount Jack", Manufacturer_Name="TE Connectivity", Mouser Part Number=N/A, Geometry.Height=1.3mm, Manufacturer_Part_Number=CONUFL001-SMD-T, Mouser Price/Stock=https://www.mouser.co.uk/ProductDetail/TE-Connectivity/CONUFL001-SMD-T?qs=3Rah4i%252BhyCHmRzMH%252BkLkPQ%3D%3D
L1: library part MLZ2012M150WT000, "Power Inductors - SMD 15 UH 20% shielded 250mA", Arrow Part Number=LQW15AN2N2G80D, Manufacturer_Name=TDK, Mouser Part Number=810-MLZ2012M150WT000, Arrow Price/Stock=https://www.arrow.com/en/products/lqw15an2n2g80d/murata-manufacturing, Datasheet Link=https://product.tdk.com/system/files/dam/doc/product/inductor/inductor/smd/catalog/inductor_commercial_decoupling_mlz2012_en.pdf, Height=1.25mm, Manufacturer_Part_Number=MLZ2012M150WT000, Mouser Price/Stock=https://www.mouser.co.uk/ProductDetail/Murata-Electronics/LQW15AN2N2G80D?qs=QzBtWTOodeXwqmhCVrS0ZQ%3D%3D
LED1: "0.35mm Height Chip LED with Full Color, Everlight, 1616 SMD", Supplier Part Number 1=1080-19-337/R6GHBHC-A01/2TCT-ND, Supplier 1=Digikey
Q1: "-20-V, P channel NexFET™ power MOSFET, single WLP 1 mm x 1 mm, 47 mOhm, gate ESD protection", MPN=CSD25213W10
R1 R2 R3: library part RES_0603, "Resistor 0603 generic"
R4 R5 R6 R7 R8 R9 R10 R11 R12 R13 R14 R15 R16 R17 R18 R19 R20 R24 R28 R30 R31 R32 R33: library part RES_0402, "Resistor 0402 generic, 1/16W"
S1 S2 S6: "Switch normally open (NO)", Manufacturer_Name="Wurth Elektronik", Mouser Part Number=710-435151014824, Datasheet Link=https://componentsearchengine.com/Datasheets/2/435151014824.pdf, Height=1.4mm, Manufacturer_Part_Number=435151014824, Mouser Price/Stock=https://www.mouser.co.uk/ProductDetail/Wurth-Elektronik/435151014824?qs=OlC7AqGiEDkCCtReGm3ZVw%3D%3D
U1: "SC0914(13) / ARM Microcontrollers - MCU IC RP2040 (RP2B2) T&R, 3,400 (13\" reel) UICC01104"
U2: "RF Transceiver Long range 2.4 GHz Wireless Transceiver"
U3: "FLASH - NOR Memory IC 16Mbit SPI - Quad I/O 133 MHz 6 ns 8-USON (2x3)"
U4: "ESD Protection Diodes / TVS Diodes ESD Protection Low Cap", Manufacturer_Name=STMicroelectronics, Mouser Part Number=511-USBLC6-2SC6, Arrow Part Number=USBLC6-2SC6, Arrow Price/Stock=https://www.arrow.com/en/products/usblc6-2sc6/stmicroelectronics?region=nac, Datasheet Link=http://www.st.com/st-web-ui/static/active/en/resource/technical/document/datasheet/CD00050750.pdf, Height=1.45mm, Manufacturer_Part_Number=USBLC6-2SC6, Mouser Price/Stock=https://www.mouser.co.uk/ProductDetail/STMicroelectronics/USBLC6-2SC6?qs=po45yt2pPpu%2FhNIlwQdTlg%3D%3D
U5: "LDO Voltage Regulators 300mA uCap ULDO High PSRR Low Noise Regulator"
U7 U8: "MOSFETs 30V 250mA Dual N-Channel"
X1: "Crystals Ultra Miniature Ceramic SMD Crystal / 12MHz 10pF 30PPM 3.2mm x 2.5mm 50R", ComponentLink1Description=Datasheet, ComponentLink1URL=https://www.mouser.de/datasheet/2/122/ECX_1637B-1633271.pdf, ComponentLink2Description="Product Detail", ComponentLink2URL=https://eu.mouser.com/ProductDetail/ECS/ECS-320-8-37B-CKY-TR?qs=l7cgNqFNU1jF5E15eCxZkA%3D%3D
X2: "TCXO Oscillators 52.000 MHz MultiVolt TCXO Clipped Sine Wave 1.7 - 3.6 0.5 ppm -30 - +85C 1.6 x 1.2 mm 4 Pad SM", M=ECS, MPN=ECS-TXO-16CSMV4-520-AY-TR

## Free pads (board coordinates)
  round 2 hole 2.2 unplated: 3(-7.5,-16.75) 3(0,19) 3(7.5,-16.75)

## Via types
v1: diameter 0.55, hole 0.25, Top Layer to Bottom Layer, tented both sides, 204 vias
v2: diameter 0.45, hole 0.25, Top Layer to Bottom Layer, tented both sides, 30 vias
v3: diameter 0.6, hole 0.3, Top Layer to Bottom Layer, tented both sides, 10 vias
v4: diameter 0.5, hole 0.25, Top Layer to Bottom Layer, tented both sides, 3 vias
v5: diameter 0.5, hole 0.3, Top Layer to Bottom Layer, tented both sides, 2 vias
v6: diameter 0.45, hole 0.2, Top Layer to Bottom Layer, tented both sides, 1 vias

## Nets (pads, with @x,y where several pads share a name; then routed paths per layer and width w, separated by ;. In a path a pad name is that pad's centre, name@x,y a point inside that pad or via, vN(x,y) a via of type N, cw(c..) or ccw(c..) an arc to the next point about the centre after c; other vN are vias at no path point)
+1V1: C4.2 C5.2 C14.2 U1.23 U1.45 U1.50 | length 11
  Top Layer w0.2: C4.2@-6.2,-1.331 -5.775,-1.331 -5.607,-1.316 -5.453,-1.27 -5.311,-1.193 -5.181,-1.085 -4.914,-0.818 -4.799,-0.723 -4.673,-0.655 -4.536,-0.614 -4.387,-0.6 U1.23@-3.437,-0.6 ; v3@2.198,-1.485 2.513,-1.8 U1.45@3.437,-1.8 4.3,-1.8 5.8,-3.3 v1(5.8,-4.2) ; U1.50@3.437,0.2 4.609,0.2 4.701,0.208 4.786,0.234 4.864,0.276 4.935,0.335 5.026,0.426 5.065,0.458 5.108,0.481 5.154,0.495 5.205,0.5 v1(6.1,0.5)
  other v1: -6.2,-1.3
  other v3: 2.192,-1.485 -2.132,-0.501
+3V3: B2.5 B2.8 C3.2 C6.2 C7.2 C8.2 C9.2 C10.2 C11.2 C12.2 C13.2 C16.2 C21.2 C26.2 C27.2 C28.2 D2.1 FB1.1 H1.1 H3.1 H5.1 LED1.4 LED1.5 LED1.6 R6.2 R9.1 R19.2 R24.2 R28.2 R31.2 R33.2 U1.1 U1.10 U1.22 U1.33 U1.42 U1.43 U1.44 U1.48 U1.49 U2.15 U3.8 U5.5 | length 43.6
  Top Layer w0.15: C26.2@-0.2,9.3 C26.2@-0.15,9.35 ; C11.2@4.184,4.484 4.231,4.531 4.247,4.56 C11.2@4.215,4.57
  Top Layer w0.2: C28.2@-11.4,4 -10.5,4 -10.333,4.167 -10.333,4.563 B2.8@-10.308,4.588 ; C27.2@-11.4,7.07 -11.18,6.85 -10.929,6.85 -10.593,6.515 -10.593,6.275 -10.568,6.25 B2.5@-10.471,6.25 ; C7.2@-6.2,-0.2 -2.77,-0.2 ; v1(-6.1,11.6) -6.1,11.695 -6,11.795 R9.1@-6,12.4 ; -1.131,2.687 -1.059,2.759 -1.033,2.79 -1.015,2.824 -1.004,2.862 -1,2.902 -1,4.582 -0.992,4.674 -0.966,4.759 -0.924,4.837 -0.865,4.908 -0.774,4.999 -0.742,5.038 -0.719,5.081 -0.705,5.127 -0.7,5.178 v1(-0.7,5.8) ; v2(-1.012,-4.516) -1,-4.503 U1.33@-1,-3.437 ; C26.2@-0.15,9.35 U2.15@-0.15,11.15 ; 2.5,-0.6 U1.48@3.437,-0.6 4.719,-0.6 ; 2.6,-0.2 U1.49@3.437,-0.2 4.502,-0.2 4.719,-0.417 4.719,-0.6 ; 2.6,2.6 U1.1@2.6,3.437 2.6,3.786 2.605,3.841 2.62,3.892 2.646,3.938 2.681,3.981 3.005,4.305 3.144,4.421 3.297,4.504 3.464,4.553 3.645,4.57 C11.2@4.215,4.57 ; C11.2@4.184,4.484 4.156,4.431 4.213,4.413 4.323,4.413 4.362,4.418 4.39,4.435 4.407,4.463 4.413,4.503 4.413,4.63 4.416,4.663 4.425,4.693 4.44,4.721 4.461,4.747 4.493,4.779 4.507,4.791 4.523,4.799 4.539,4.804 4.557,4.805 4.749,4.805 4.824,4.812 4.894,4.833 4.958,4.868 5.016,4.916 5.137,5.037 5.18,5.088 5.21,5.145 5.229,5.207 5.235,5.274 5.235,5.494 5.237,5.514 5.242,5.532 5.252,5.549 5.264,5.564 v1(5.3,5.6) ; v1(6.1,-0.5) 6,-0.6 4.719,-0.6 ; R31.2@8,13.414 8.2,13.614 8.2,13.908 8.4,14.107 v1(8.4,14.2) ; U3.8@10.426,2.717 10.426,2.676 U3.8@10.474,2.627 ; R33.2@11.4,9.9 v1(11.4,10.7)
  Top Layer w0.25: H3.1@-14.4,-17.8 v1(-14,-18.2) ; H3.1@-13.9,-17.3 v1(-13.5,-17.7) ; H3.1@-13.4,-16.8 v1(-13,-17.2) ; v1(-12.623,4.477) -12.623,4.423 -12.2,4 C28.2@-11.5,4 ; v1(-12.6,7.1) C27.2@-11.5,7.1 ; v3(-8.649,16.804) FB1.1@-7.949,16.804 ; R28.2@-6.1,7.8 v1(-5.3,7.8) ; R24.2@4.034,8.4 v1(4.6,8.4) ; v1(10,-14.2) H1.1@10.4,-13.8 ; v1(10.5,-14.7) H1.1@10.9,-14.3 ; v1(11,-15.2) H1.1@11.4,-14.8 ; R6.2@11.5,7.9 v1(11.5,8.6)
  Top Layer w0.3: U3.8@10.474,2.627 C16.2@11.373,2.627
  Top Layer w0.35: C16.2@11.373,2.627 C21.2@12.363,2.627 12.376,2.614 13.086,2.614 v1(13.1,2.6)
  Bottom Layer w0.2: R19.2@-15.485,-10.492 -15.485,-10.462 -15.265,-10.242 -14.665,-10.242 -12.455,-8.032 H5.1@-12.455,-6.4
  other v1: -6.2,-0.3 -0.207,9.307
  other v3: 13.7,-3.5 13.7,-2.8
  other v4: 3.1,-3.4 3.8,-3.4 4.6,-3.4
+3V3_BYP: C2.2 U5.4 | length 1.1
  Top Layer w0.15: U5.4@13.005,-0.15 U5.4@13.1,-0.055
  Top Layer w0.4: U5.4@13.1,-0.055 C2.2@13.1,0.9
+3V3_CATH: D2.2 R3.2 | length 1.2
  Top Layer w0.3: R3.2@10.6,-0.275 D2.2@11.8,-0.275
+VBAT: H1.4 Q1.B1 R30.2 | length 19.7
  Top Layer w0.15: R30.2@9.585,-15.885 9.868,-16.168 9.99,-16.27 10.124,-16.342 10.27,-16.386 10.428,-16.4 11.293,-16.4 11.633,-16.369 11.948,-16.275 12.237,-16.119 12.5,-15.9 14.936,-13.464 15.075,-13.348 15.227,-13.266 15.393,-13.216 15.573,-13.2 15.823,-13.2 15.922,-13.209 16.013,-13.236 16.097,-13.282 16.173,-13.345 H1.4@16.614,-13.785 ; H1.4@16.68,-13.511 16.651,-13.546 16.63,-13.584 16.618,-13.626 16.614,-13.671 H1.4@16.614,-13.785 ; H1.4@17.134,-14.306 H1.4@16.614,-13.785
  Top Layer w0.22: Q1.B1@14.1,-6 15.5,-6
  Top Layer w0.3: 15.5,-6 15.724,-6.021 15.931,-6.082 16.12,-6.185 16.293,-6.328 16.513,-6.549
  Top Layer w0.35: 16.513,-6.549 16.592,-6.644 16.649,-6.748 16.683,-6.862 16.694,-6.985 16.694,-8.544 16.711,-8.731 16.763,-8.904 16.849,-9.063 16.969,-9.208 17.154,-9.392 17.22,-9.472 17.267,-9.559 17.296,-9.654 17.305,-9.757 17.305,-12.488 17.287,-12.68 17.235,-12.857 17.147,-13.019 17.024,-13.167 H1.4@16.68,-13.511
+VSYS: C1.2 D3.1 H1.6 Q1.A2 Q1.B2 U5.1 U5.3 | length 19
  Top Layer w0.3: U5.1@15.595,-2.05 14.75,-2.05 14.6,-1.9 14.6,-0.3 14.75,-0.15 U5.3@15.595,-0.15
  Top Layer w0.4: v2(13.2,-16) 13.2,-16.014 14.306,-17.12 H1.6@14.306,-17.134
  Bottom Layer w0.4: v2(13.2,-16) 13.2,-15.56 13.216,-15.387 13.264,-15.226 13.343,-15.079 13.455,-14.945 15.18,-13.22 15.205,-13.193 15.502,-12.835 15.723,-12.427 15.856,-11.982 15.9,-11.5 15.9,-4.46 15.9,-4.28 v1(15.9,-4.1) 15.9,-3.92 15.9,-3.74 v1(15.9,-3.3)
+VUSB: D3.2 H1.3 J1.A4B9 J1.B4A9 Q1.A1 R20.2 U4.5 | length 17.1
  Top Layer w0.2: v5(2.171,-12.25) 2.19,-12.231 2.19,-11.417 2.2,-11.407 J1.B4A9@2.2,-10.78
  Top Layer w0.3: J1.B4A9@2.25,-10.73 J1.B4A9@2.4,-10.58 ; U4.5@8.2,-7.45 v1(8.2,-6.7) ; R20.2@13.6,-7.2 Q1.A1@13.6,-6
  Top Layer w0.35: J1.A4B9@-2.4,-10.58 v5(-2.4,-9.2)
  Top Layer w0.4: H1.3@14.094,-11.266 14.084,-11.256 14.081,-11.252 14.078,-11.247 14.077,-11.242 14.076,-11.237 14.076,-11.01 14.085,-10.92 14.109,-10.837 14.15,-10.761 14.208,-10.692 14.809,-10.091 15.024,-9.833 15.177,-9.549 15.269,-9.24 15.3,-8.905 D3.2@15.3,-7.155
  Bottom Layer w0.3: v5(-2.4,-9.2) 0.65,-12.25 v5(2.171,-12.25) ; v1(8.2,-6.7) 8.2,-5
  other v1: 12.5,-8 12.5,-7.2
BMI270_CSB: B2.12 R28.1 U1.12 | length 13.7
  Top Layer w0.15: B2.12@-8.645,5.25 -8.064,5.25 -7.939,5.239 -7.825,5.204 -7.719,5.147 -7.623,5.067 -7.414,4.859 -7.408,4.851 -7.404,4.843 -7.401,4.834 -7.4,4.824 v1(-7.4,4.8) ; v1(-8.2,7.8) R28.1@-7.1,7.8 ; v1(-2.423,5.477) -2.4,5.477 -2.39,5.476 -2.382,5.474 -2.374,5.469 -2.367,5.464 -2.055,5.152 -1.944,5.018 -1.864,4.87 -1.816,4.71 -1.8,4.536 U1.12@-1.8,3.437
  Bottom Layer w0.15: v1(-8.2,7.8) -8.2,6.076 -8.18,5.858 -8.12,5.656 -8.02,5.471 -7.88,5.303 -7.492,4.915 -7.49,4.913 -7.489,4.911 -7.488,4.908 -7.488,4.905 -7.488,4.898 -7.488,4.893 -7.486,4.889 -7.484,4.885 -7.481,4.881 -7.436,4.836 -7.418,4.818 v1(-7.4,4.8) -7.382,4.782 -7.364,4.764 -6.942,4.342 -6.867,4.28 -6.785,4.235 -6.696,4.209 -6.599,4.2 -6.357,4.2 ; -6.352,4.198 -6.351,4.197 ; -6.349,4.196 -5.852,4.196 ; -5.848,4.198 -5.847,4.199 ; -5.844,4.2 -4.513,4.2 -4.121,4.236 -3.76,4.344 -3.428,4.523 -3.125,4.775 v1(-2.423,5.477)
BMI270_INT1: B2.4 U1.7 | length 15.8
  Top Layer w0.15: B2.4@-10.308,6.913 -10.308,7.341 -10.293,7.51 -10.246,7.666 -10.169,7.81 -10.06,7.94 -9.587,8.413 -9.384,8.582 -9.16,8.703 -8.916,8.776 -8.653,8.8 -5.509,8.8 -5.264,8.778 -5.037,8.71 -4.829,8.598 -4.64,8.44 -4.398,8.198 -4.294,8.111 -4.179,8.049 -4.055,8.012 -3.92,8 -2.664,8 -2.511,7.986 -2.369,7.944 -2.239,7.873 -2.121,7.775 -1.97,7.624 -1.904,7.57 -1.833,7.531 -1.755,7.508 -1.671,7.5 -0.455,7.5 -0.332,7.489 -0.219,7.455 -0.115,7.399 -0.02,7.32 0.101,7.199 0.144,7.147 0.175,7.09 0.194,7.027 0.2,6.96 U1.7@0.2,3.437
BMI270_INT2: B2.9 U1.9 | length 11.8
  Top Layer w0.15: B2.9@-9.808,4.588 -9.808,4.287 -9.8,4.195 -9.774,4.11 -9.732,4.032 -9.673,3.961 -9.582,3.87 -9.543,3.838 -9.5,3.815 -9.454,3.801 -9.403,3.796 -7.439,3.796 -7.374,3.802 -7.314,3.82 -7.259,3.85 -7.209,3.891 -7.144,3.956 -7.117,3.978 -7.087,3.995 -7.054,4.005 -7.018,4.008 -3.968,4.008 -3.843,3.997 -3.727,3.962 -3.621,3.905 -3.524,3.824 v1(-3.3,3.6) ; U1.9@-0.6,3.437 -0.6,4.211 -0.593,4.284 -0.573,4.351 -0.54,4.413 -0.493,4.469 v6@-0.362,4.6
  Bottom Layer w0.15: v1(-3.3,3.6) -1.99,3.6 -1.684,3.628 -1.401,3.712 -1.141,3.853 -0.904,4.05 v6(-0.354,4.6)
BMI270_MISO: B2.1 U1.11 | length 9.9
  Top Layer w0.15: B2.1@-8.808,6.913 -8.808,6.936 -8.807,6.944 -8.805,6.953 -8.801,6.96 -8.795,6.967 -8.775,6.987 -8.766,6.995 -8.756,7 -8.746,7.003 -8.734,7.004 -4.096,7.004 -3.614,6.96 -3.169,6.827 -2.76,6.606 -2.389,6.297 -1.845,5.753 -1.65,5.519 -1.511,5.262 -1.428,4.982 -1.4,4.679 U1.11@-1.4,3.437
BMI270_MOSI: B2.14 U1.14 | length 7.4
  Top Layer w0.15: B2.14@-8.645,6.25 -7.445,6.25 -7.062,6.215 -6.708,6.109 -6.383,5.934 -6.087,5.687 -5.709,5.309 -5.547,5.174 -5.368,5.077 -5.173,5.019 -4.962,5 -3.909,5 -3.664,4.978 -3.437,4.91 -3.229,4.798 -3.04,4.64 -2.798,4.398 -2.711,4.294 -2.649,4.18 -2.612,4.055 -2.6,3.92 U1.14@-2.6,3.437
BMI270_SCK: B2.13 U1.13 | length 8.2
  Top Layer w0.15: B2.13@-8.645,5.75 -7.407,5.75 -7.301,5.74 -7.203,5.711 -7.114,5.663 -7.032,5.595 -6.861,5.424 -6.851,5.415 -6.84,5.409 -6.828,5.406 -6.815,5.405 v1(-6.783,5.405) ; v1(-5.252,5.848) -5.213,5.848 -5.198,5.847 -5.184,5.843 -5.172,5.836 -5.16,5.826 -4.926,5.592 -4.825,5.508 -4.714,5.448 -4.593,5.412 -4.463,5.4 -3.768,5.4 -3.494,5.375 -3.242,5.3 -3.01,5.174 -2.798,4.998 -2.469,4.669 -2.351,4.528 -2.267,4.372 -2.217,4.203 -2.2,4.019 U1.13@-2.2,3.437
  Bottom Layer w0.15: v1(-6.783,5.405) -6.532,5.656 -6.424,5.746 -6.305,5.81 -6.175,5.849 -6.035,5.862 -5.274,5.862 -5.269,5.861 -5.266,5.86 -5.262,5.858 -5.259,5.856 v1(-5.252,5.848)
CATH_RGB_B: LED1.1 R10.1 | length 1.1
  Bottom Layer w0.2: R10.1@-11.55,-15.05 -11.45,-15.15 -11.45,-15.55 -11.397,-15.603 -11.397,-15.953 LED1.1@-11.3,-16.05
CATH_RGB_G: LED1.3 R12.1 | length 1.1
  Bottom Layer w0.2: LED1.3@-9.8,-16.05 -9.703,-15.953 -9.703,-15.603 -9.65,-15.55 -9.65,-15.15 R12.1@-9.55,-15.05
CATH_RGB_R: LED1.2 R11.1 | length 1
  Bottom Layer w0.2: LED1.2@-10.55,-16.05 R11.1@-10.55,-15.05
GATE_RGB_B: R17.2 U8.2 | length 1.3
  Bottom Layer w0.2: R17.2@-15.632,-14.587 U8.2@-14.357,-14.587
GATE_RGB_G: R14.2 U7.5 | length 1
  Bottom Layer w0.25: R14.2@-12.55,-12.3 U7.5@-11.525,-12.3
GATE_RGB_R: R13.2 U7.2 | length 1.5
  Bottom Layer w0.2: U7.2@-9.575,-12.3 -9.05,-12.3 -8.75,-12 R13.2@-8.2,-12
GND: B1.2 B1.4 B2.6 B2.7 C1.1 C2.1 C3.1 C4.1 C5.1 C6.1 C7.1 C8.1 C9.1 C10.1 C11.1 C12.1 C13.1 C14.1 C15.2 C16.1 C17.2 C19.1 C20.1 C21.1 C22.1 C23.1 C24.1 C25.1 C26.1 C27.1 C28.1 C29.1 H1.2 H1.5 H2.2 H2.5 H3.2 H3.5 H4.1 H4.2 H4.3 H4.5 H5.3 J1.A1B12 J1.B1A12 J2.2 J2.3 R1.1 R2.1 R3.1 R15.2 R16.2 R18.2 R20.1 R32.1 S1.1 S1.2 S1.5 S1.6 S2.1 S2.2 S2.5 S2.6 S6.1 S6.2 S6.5 S6.6 U1.19 U1.57 U2.13 U2.20 U2.21 U2.23 U2.24 U2.25 U3.4 U4.2 U5.2 U7.1 U7.4 U8.1 X1.2 X1.4 X2.1 X2.2 | length 25.5
  Top Layer w0.15: C28.1@-11.5,5 -11.5,5.005 C28.1@-11.255,5.25 ; v2(-4.8,1.2) -4.752,1.2 -4.733,1.198 -4.715,1.193 -4.699,1.184 -4.684,1.172 -4.59,1.077 ; C24.1@-3.1,10.6 C24.1@-3,10.7 ; v1(0.9,12.4) U2.20@2.1,12.4 ; v1(0.9,13.9) U2.23@2.1,13.9 U2.24@2.1,14.4 ; U5.2@15.595,-1.1 U5.2@15.795,-0.9 ; C1.1@16.95,-0.9 C1.1@17.1,-0.75
  Top Layer w0.2: C28.1@-11.255,5.25 B2.7@-10.471,5.25 ; -4.59,1.077 -4.549,1.044 -4.504,1.019 -4.455,1.005 -4.403,1 U1.19@-3.437,1 ; U2.13@-1.15,11.15 U2.25@-1.15,11.9
  Top Layer w0.25: U2.20@2.3,12.375 U2.21@2.3,12.825 ; C9.1@2.8,-5.6 2.8,-5.595 2.995,-5.4 3.605,-5.4 3.8,-5.205 C13.1@3.8,-5.2 C6.1@4.8,-5.2 C14.1@5.8,-5.2 ; J1.B1A12@3.2,-10.58 3.2,-10.226 J1.B1A12@3.375,-10.051 ; v1@3.949,-10.051 v1(4,-10) ; U4.2@8.2,-4.95 8.2,-5.9 8.36,-6.059 8.859,-6.059 v2(8.9,-6.1) ; U5.2@15.795,-0.9 C1.1@16.95,-0.9
  Top Layer w0.3: C4.1@-7.2,-1.331 C7.1@-7.2,-0.3 ; v1(-4,10.6) C24.1@-3.1,10.6 ; 3.523,12.371 B1.2@3.523,13.059 ; B1.4@3.523,13.759 3.523,14.511
  Top Layer w0.45: J1.B1A12@3.375,-10.051 v1@3.949,-10.051
  Bottom Layer w0.25: -13.6,-13.1 -13.45,-12.95 U7.4@-11.525,-12.95
  Bottom Layer w0.3: v1(-17.169,-10.492) C22.1@-16.469,-10.492 ; H5.3@-12.455,-4.4 v1(-11.304,-4.4)
  Bottom Layer w0.6: C8.1@0,-3.5 v1(0,0)
  other v1: 9.492,-17.505 10.992,-17.505 12.492,-17.505 -15.3,-16.7 15,-16.3 -12.258,-16.005 -3.258,-16.005 -1.758,-16.005 -0.258,-16.005 1.242,-16.005 2.742,-16.005 -5.75,-15.75 5.75,-15.75 -16.8,-15.4 -7.5,-15 16.3,-15 -7.008,-14.505 -2.508,-14.505 -1.008,-14.505 0.492,-14.505 1.992,-14.505 3.492,-14.505 -0.258,-13.005 18.219,-12.027 -17.508,-11.505 -5.508,-11.505 9.492,-11.505 11.5,-11.5 -9.6,-11.1 7.9,-10.5 5.3,-10.3 6.7,-10.3 9.2,-10 -4,-9.9 -3.3,-9.2 10.61,-8.081 2.2,-7.4 3.4,-7.4 -13.758,-7.005 10.6,-6.9 6,-6.4 10.6,-5.6 -8.508,-5.505 17.339,-5.344 11.3,-4.2 -16.758,-4.005 -15.258,-4.005 -13.758,-4.005 9.7,-3.1 -16.008,-2.505 9.1,-2 8.2,-1 -0.707,-0.707 0.707,-0.707 17.1,0.1 7.992,0.495 9.492,0.495 -0.707,0.707 0.707,0.707 15.1,1 -14.2,1.5 -16.758,1.995 -15.258,1.995 16.242,1.995 -16.008,3.495 7.992,3.495 15.492,3.495 16.992,3.495 -8.1,4.4 11.4,4.4 12.4,4.4 -6.1,4.8 -16.758,4.995 11.742,4.995 -12.6,5.3 8.3,5.4 -12.6,6.1 -3.1,6.1 -4.5,6.3 -16.008,6.495 13.992,6.495 15.492,6.495 16.992,6.495 4.3,7 -2.4,7.2 0.8,7.6 9.3,7.9 -16.758,7.995 7.242,7.995 -1,8.2 -17.508,9.495 -7.008,9.495 -5.508,9.495 3.492,9.495 4.992,9.495 6.492,9.495 13.992,9.495 15.492,9.495 16.992,9.495 4.242,10.995 5.742,10.995 8.742,10.995 16.242,10.995 17.742,10.995 -4.7,11.4 -13.4,12 4.226,12.314 2.9,12.4 5.248,12.393 13.992,12.495 15.492,12.495 16.992,12.495 6.532,12.745 15.9,13.1 0.1,13.2 -12,13.4 13.9,13.9 5.292,14.31 2.9,14.5 4.3,14.5 14.5,14.5 -16.4,15 -8.508,15.495 -2.508,15.495 3.492,15.495 4.8,15.5 7.8,15.5 9.492,15.495 10.992,15.495 12.492,15.495 -4.4,15.7 -7.149,15.804 13.1,16 -15,16.4 3.8,16.8 8.8,16.8 -12.258,16.995 -10.758,16.995 10.242,16.995 11.742,16.995 3.8,17.5 8.8,17.5 -10.008,18.495 3.492,18.495 6.492,18.495 9.492,18.495 4.8,18.7 7.8,18.7 -7.758,19.995 -6.258,19.995 -4.758,19.995 -3.258,19.995 -1.758,19.995 2.742,19.995 4.242,19.995 5.742,19.995 7.242,19.995
  other v2: -8,-7.6 -10.3,-7.5 5,-7.2 5.4,-6 7.2,13.9
  other v3: 2.75,17.25 1.75,18.25
MCU_ADC1: H3.6 U1.38 | length 18.4
  Top Layer w0.125: H3.6@-11.266,-14.094 -7.335,-10.164 -7.039,-9.917 -6.713,-9.741 -6.358,-9.635 -5.974,-9.6 -5.438,-9.6 -5.227,-9.581 -5.032,-9.522 -4.853,-9.426 -4.69,-9.29 -4.315,-8.915 -4.154,-8.781 -3.977,-8.685 -3.784,-8.628 -3.575,-8.608 -1.609,-8.608 -1.127,-8.564 -0.682,-8.432 -0.273,-8.211 0.099,-7.901 0.594,-7.406 0.772,-7.192 0.899,-6.958 0.975,-6.703 1,-6.426 U1.38@1,-3.437
MCU_DShotM1: H2.6 U1.15 | length 18.3
  Top Layer w0.125: H2.6@-14.094,11.266 -14.094,11.06 -14.086,10.979 -14.064,10.904 -14.027,10.835 -13.975,10.773 -13.509,10.307 -13.418,10.197 -13.352,10.076 -13.313,9.944 -13.3,9.802 -13.3,9.44 -13.306,9.373 -13.325,9.31 -13.356,9.253 -13.399,9.201 -13.52,9.08 -13.599,8.985 -13.655,8.881 -13.689,8.768 -13.7,8.645 -13.7,5.264 -13.666,4.896 -13.565,4.556 -13.396,4.244 -13.16,3.96 -12.797,3.597 -12.641,3.467 -12.469,3.374 -12.282,3.319 -12.08,3.3 -4.207,3.3 -4.107,3.291 -4.015,3.263 -3.931,3.218 -3.854,3.154 -3.755,3.055 -3.72,3.013 -3.695,2.966 -3.68,2.916 -3.675,2.861 -3.675,2.641 -3.674,2.633 -3.672,2.626 -3.668,2.62 -3.663,2.614 -3.656,2.606 -3.653,2.603 -3.649,2.602 -3.645,2.6 -3.641,2.6 U1.15@-3.437,2.6
MCU_DShotM2: H2.4 U1.16 | length 25.9
  Top Layer w0.125: H2.4@-11.266,14.094 -12.162,14.99 -12.219,15.038 -12.283,15.073 -12.352,15.093 -12.427,15.1 -12.617,15.1 -12.753,15.088 -12.879,15.05 -12.995,14.988 -13.1,14.9 -15.542,12.458 -15.611,12.375 -15.661,12.284 -15.69,12.185 -15.7,12.077 -15.7,11.805 -15.682,11.61 -15.628,11.43 -15.539,11.264 -15.414,11.114 -14.746,10.446 -14.507,10.159 -14.337,9.843 -14.234,9.5 -14.2,9.128 -14.2,5.091 -14.161,4.662 -14.042,4.265 -13.846,3.901 -13.57,3.57 -13.146,3.147 -12.964,2.995 -12.764,2.887 -12.546,2.822 -12.31,2.8 -4.866,2.8 -4.69,2.784 -4.527,2.735 -4.377,2.654 -4.241,2.541 -4.067,2.367 -3.992,2.305 -3.91,2.261 -3.821,2.234 -3.724,2.225 -3.478,2.225 -3.471,2.224 -3.464,2.222 -3.457,2.219 -3.451,2.214 U1.16@-3.437,2.2
MCU_DShotM3: H2.3 U1.17 | length 27.4
  Top Layer w0.125: H2.3@-14.306,17.134 -13.339,16.167 -13.304,16.126 -13.28,16.08 -13.265,16.031 -13.26,15.977 -13.26,15.842 -13.269,15.745 -13.296,15.655 -13.34,15.572 -13.403,15.497 -16.02,12.88 -16.142,12.733 -16.23,12.571 -16.282,12.395 -16.3,12.204 -16.3,11.72 -16.268,11.373 -16.173,11.053 -16.014,10.759 -15.791,10.491 -15.191,9.891 -14.976,9.633 -14.823,9.349 -14.731,9.04 -14.7,8.706 -14.7,4.755 -14.658,4.295 -14.531,3.87 -14.32,3.48 -14.025,3.125 -13.571,2.671 -13.376,2.509 -13.162,2.393 -12.928,2.323 -12.675,2.3 -4.818,2.3 -4.665,2.286 -4.523,2.244 -4.393,2.173 -4.275,2.075 -4.124,1.924 -4.059,1.87 -3.987,1.831 -3.909,1.808 -3.825,1.8 U1.17@-3.437,1.8
MCU_DShotM4: H2.1 U1.18 | length 24
  Top Layer w0.125: H2.1@-17.134,14.306 -17.134,14.213 -17.138,14.176 -17.148,14.142 -17.165,14.11 -17.189,14.082 -17.336,13.935 -17.407,13.849 -17.459,13.753 -17.49,13.65 -17.5,13.538 -17.5,12.4 -17.456,11.918 -17.323,11.473 -17.102,11.065 -16.793,10.693 -15.907,9.807 -15.598,9.435 -15.377,9.027 -15.244,8.582 -15.2,8.1 -15.2,4.6 -15.156,4.118 -15.023,3.673 -14.802,3.265 -14.493,2.893 -13.892,2.292 -13.633,2.077 -13.349,1.923 -13.04,1.831 -12.704,1.8 -4.818,1.8 -4.695,1.789 -4.582,1.755 -4.478,1.699 -4.383,1.62 -4.262,1.499 -4.21,1.456 -4.153,1.425 -4.091,1.406 -4.023,1.4 U1.18@-3.437,1.4
MCU_I2C0_SCL: H4.6 R31.1 U1.41 | length 43.1
  Top Layer w0.125: U1.41@2.2,-3.437 2.2,-5.809 2.208,-5.901 2.234,-5.986 2.276,-6.064 2.335,-6.135 2.426,-6.226 2.465,-6.258 2.508,-6.281 2.554,-6.295 2.605,-6.3 3.626,-6.3 3.638,-6.299 3.65,-6.295 3.661,-6.289 3.671,-6.281 v2(3.693,-6.258) ; R31.1@9,13.414 9.582,13.414 9.791,13.433 9.984,13.49 10.16,13.586 10.321,13.72 10.527,13.926 10.615,13.999 10.713,14.052 10.818,14.083 10.933,14.094 11.159,14.094 11.206,14.087 11.239,14.067 11.259,14.034 11.266,13.987 11.266,13.857 11.257,13.764 11.231,13.677 11.188,13.598 11.128,13.526 10.786,13.183 10.661,13.033 10.571,12.868 10.518,12.688 10.5,12.494 v1(10.5,12)
  Bottom Layer w0.125: v2(3.693,-6.258) 4.334,-6.258 4.587,-6.282 4.82,-6.351 5.034,-6.467 5.229,-6.629 6.749,-8.149 7.121,-8.459 7.53,-8.68 7.975,-8.812 8.457,-8.856 9.811,-8.856 9.977,-8.872 10.131,-8.918 10.272,-8.994 10.401,-9.101 10.565,-9.265 10.636,-9.324 10.714,-9.366 10.799,-9.392 10.89,-9.4 12.373,-9.4 12.771,-9.363 13.139,-9.254 13.477,-9.071 13.785,-8.815 14.178,-8.422 14.319,-8.253 14.42,-8.067 14.48,-7.864 14.5,-7.645 14.5,-0.58 14.488,-0.445 14.45,-0.321 14.389,-0.206 14.302,-0.102 14.06,0.14 13.902,0.329 13.79,0.537 13.722,0.764 13.7,1.009 13.7,3.4 13.656,3.882 13.523,4.327 13.302,4.735 12.993,5.107 10.541,7.559 10.304,7.844 10.135,8.156 10.034,8.497 10,8.865 10,9.482 10.014,9.635 10.056,9.777 10.127,9.907 10.225,10.025 10.376,10.176 10.43,10.241 10.469,10.313 10.492,10.391 10.5,10.475 v1(10.5,12)
MCU_I2C0_SDA: H4.4 R33.1 U1.40 | length 41.7
  Top Layer w0.125: U1.40@1.8,-3.437 1.8,-5.786 1.817,-5.976 1.87,-6.151 1.957,-6.312 2.079,-6.459 2.266,-6.647 2.347,-6.714 2.436,-6.762 2.532,-6.79 2.637,-6.8 4.088,-6.8 4.094,-6.801 4.099,-6.802 4.104,-6.805 4.109,-6.809 v2(4.119,-6.819) ; v1(10.6,9.1) 10.645,9.145 10.664,9.161 10.685,9.172 10.708,9.179 10.733,9.181 10.849,9.181 10.856,9.182 10.862,9.184 10.868,9.187 10.873,9.192 10.88,9.198 10.883,9.201 10.886,9.203 10.89,9.204 10.894,9.204 11.952,9.204 12.025,9.211 12.093,9.231 12.155,9.264 12.211,9.311 12.284,9.384 12.31,9.415 12.328,9.449 12.339,9.486 12.343,9.526 12.343,9.807 12.344,9.824 12.349,9.84 12.357,9.855 12.369,9.869 12.386,9.886 12.393,9.892 12.401,9.896 12.41,9.899 12.42,9.9 12.691,9.9 12.797,9.91 12.896,9.939 12.986,9.988 13.069,10.057 14.035,11.023 14.061,11.054 14.079,11.088 14.09,11.125 14.094,11.164 H4.4@14.094,11.266
  Bottom Layer w0.125: v2(4.119,-6.819) 4.119,-7.149 4.131,-7.279 4.167,-7.399 4.227,-7.51 4.31,-7.61 5.293,-8.593 5.665,-8.902 6.073,-9.123 6.518,-9.256 7,-9.3 9.418,-9.3 9.602,-9.317 9.772,-9.367 9.928,-9.452 10.07,-9.57 10.251,-9.751 10.33,-9.816 10.415,-9.863 10.509,-9.891 10.61,-9.9 12.4,-9.9 12.882,-9.856 13.327,-9.723 13.735,-9.502 14.107,-9.193 14.598,-8.702 14.774,-8.49 14.9,-8.258 14.975,-8.005 15,-7.732 15,-0.317 14.988,-0.182 14.951,-0.057 14.889,0.057 14.802,0.161 14.56,0.403 14.402,0.593 14.29,0.801 14.222,1.027 14.2,1.273 14.2,3.6 14.156,4.082 14.023,4.527 13.802,4.935 13.493,5.307 10.886,7.914 10.761,8.064 10.672,8.23 10.618,8.41 10.6,8.605 v1(10.6,9.1)
MCU_PUSHBTN: S2.3 S2.4 U1.6 | length 13.7
  Top Layer w0.15: U1.6@0.6,3.437 0.6,5.567 0.604,5.614 0.617,5.658 0.639,5.698 0.669,5.734 0.728,5.793 0.739,5.807 0.748,5.821 0.752,5.838 0.754,5.855 v2(0.754,5.9) ; v2(6.6,8.7) 6.614,8.714 6.62,8.719 6.626,8.722 6.633,8.724 6.641,8.725 7.196,8.725 7.395,8.753 7.536,8.839 7.622,8.98 7.65,9.179 S2.3@7.65,11.875
  Bottom Layer w0.15: v2(0.754,5.9) 0.754,5.904 0.754,5.906 0.755,5.908 0.755,5.909 0.757,5.911 0.886,6.04 0.942,6.086 1.003,6.12 1.069,6.139 1.142,6.146 3.5,6.146 3.982,6.19 4.427,6.323 4.835,6.544 5.207,6.853 6.455,8.101 6.519,8.177 6.564,8.261 6.591,8.352 6.6,8.45 v2(6.6,8.7)